# Altium PCB LTE GNSS Tracker.PcbDoc (part 1 of 5)
Units mil, origin at the board's own origin, x right, y up, seen from the top; angles counter-clockwise.
Board outline 2165.35 x 4361.93 mil, 4 copper layers (Top Layer, Layer 1, Layer 2, Bottom Layer), stack 38.189 mil thick; 158 components, 113 nets, 617 pads, 1197 vias.
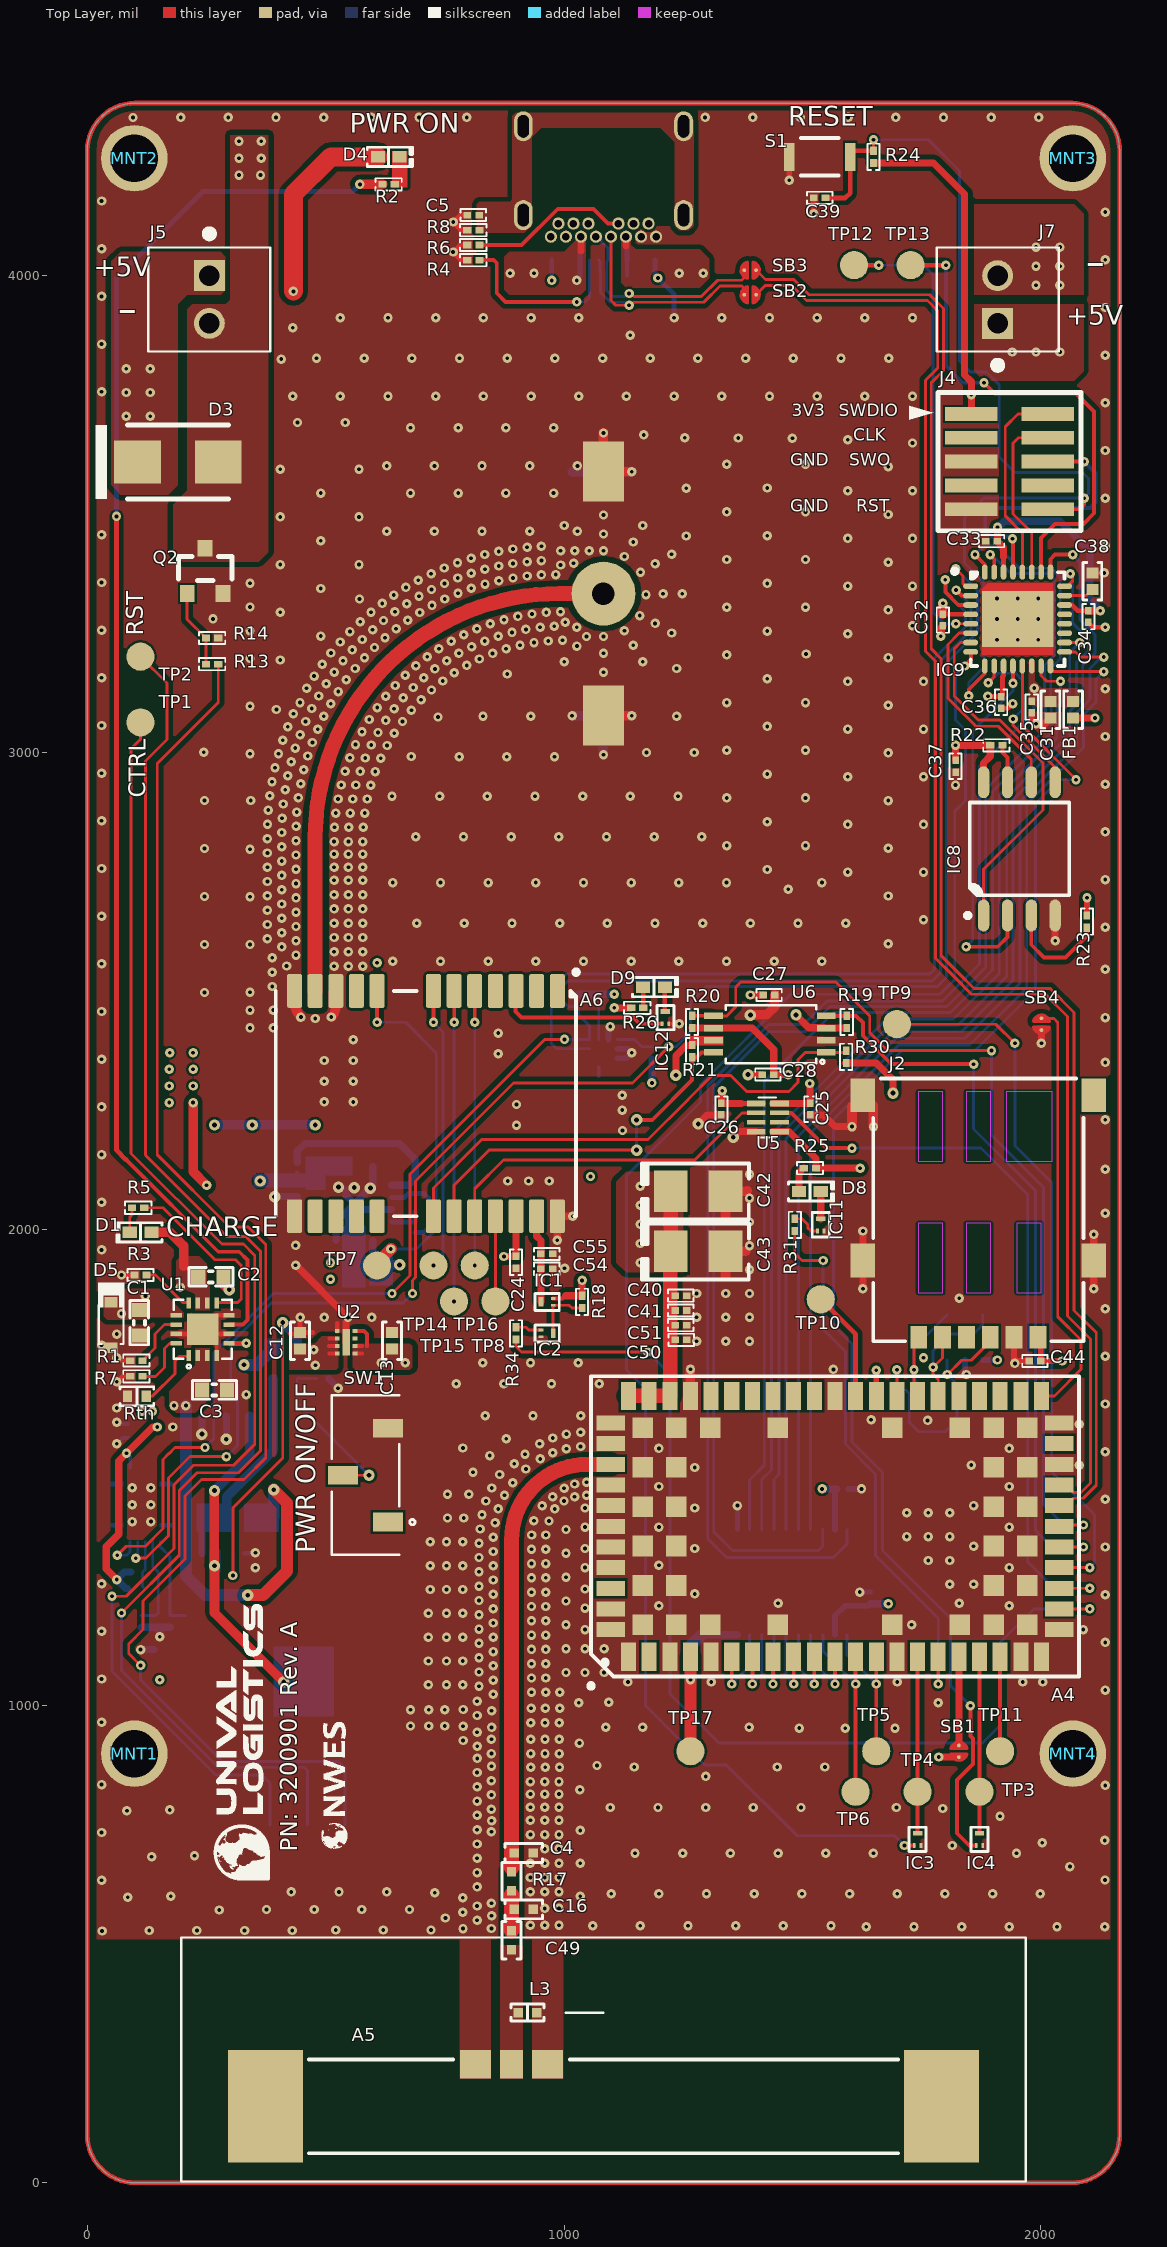
[diagram p0: Top Layer view]
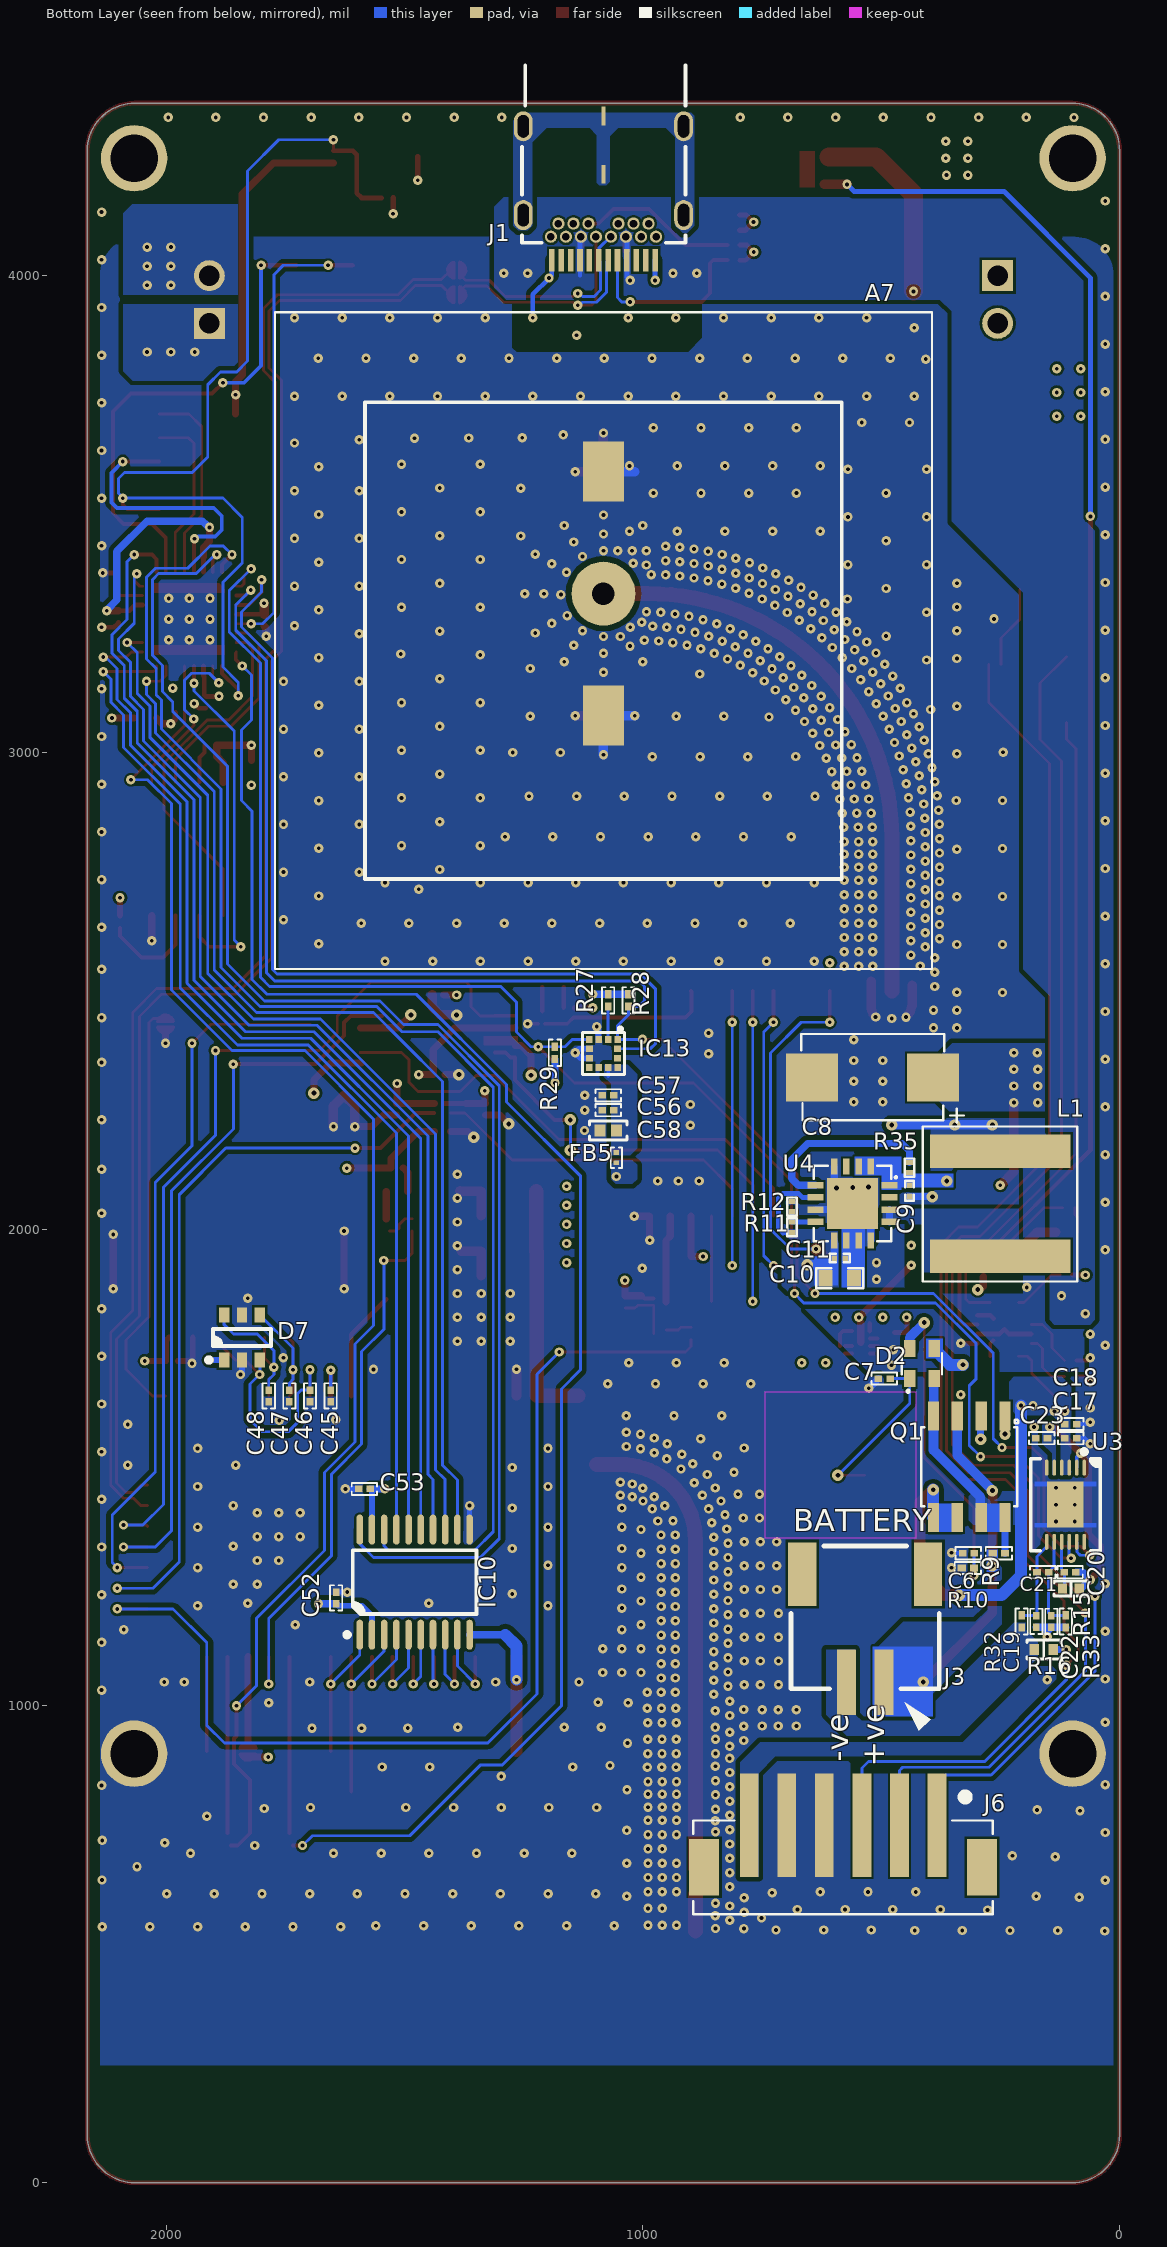
[diagram p1: Bottom Layer view, seen from below]
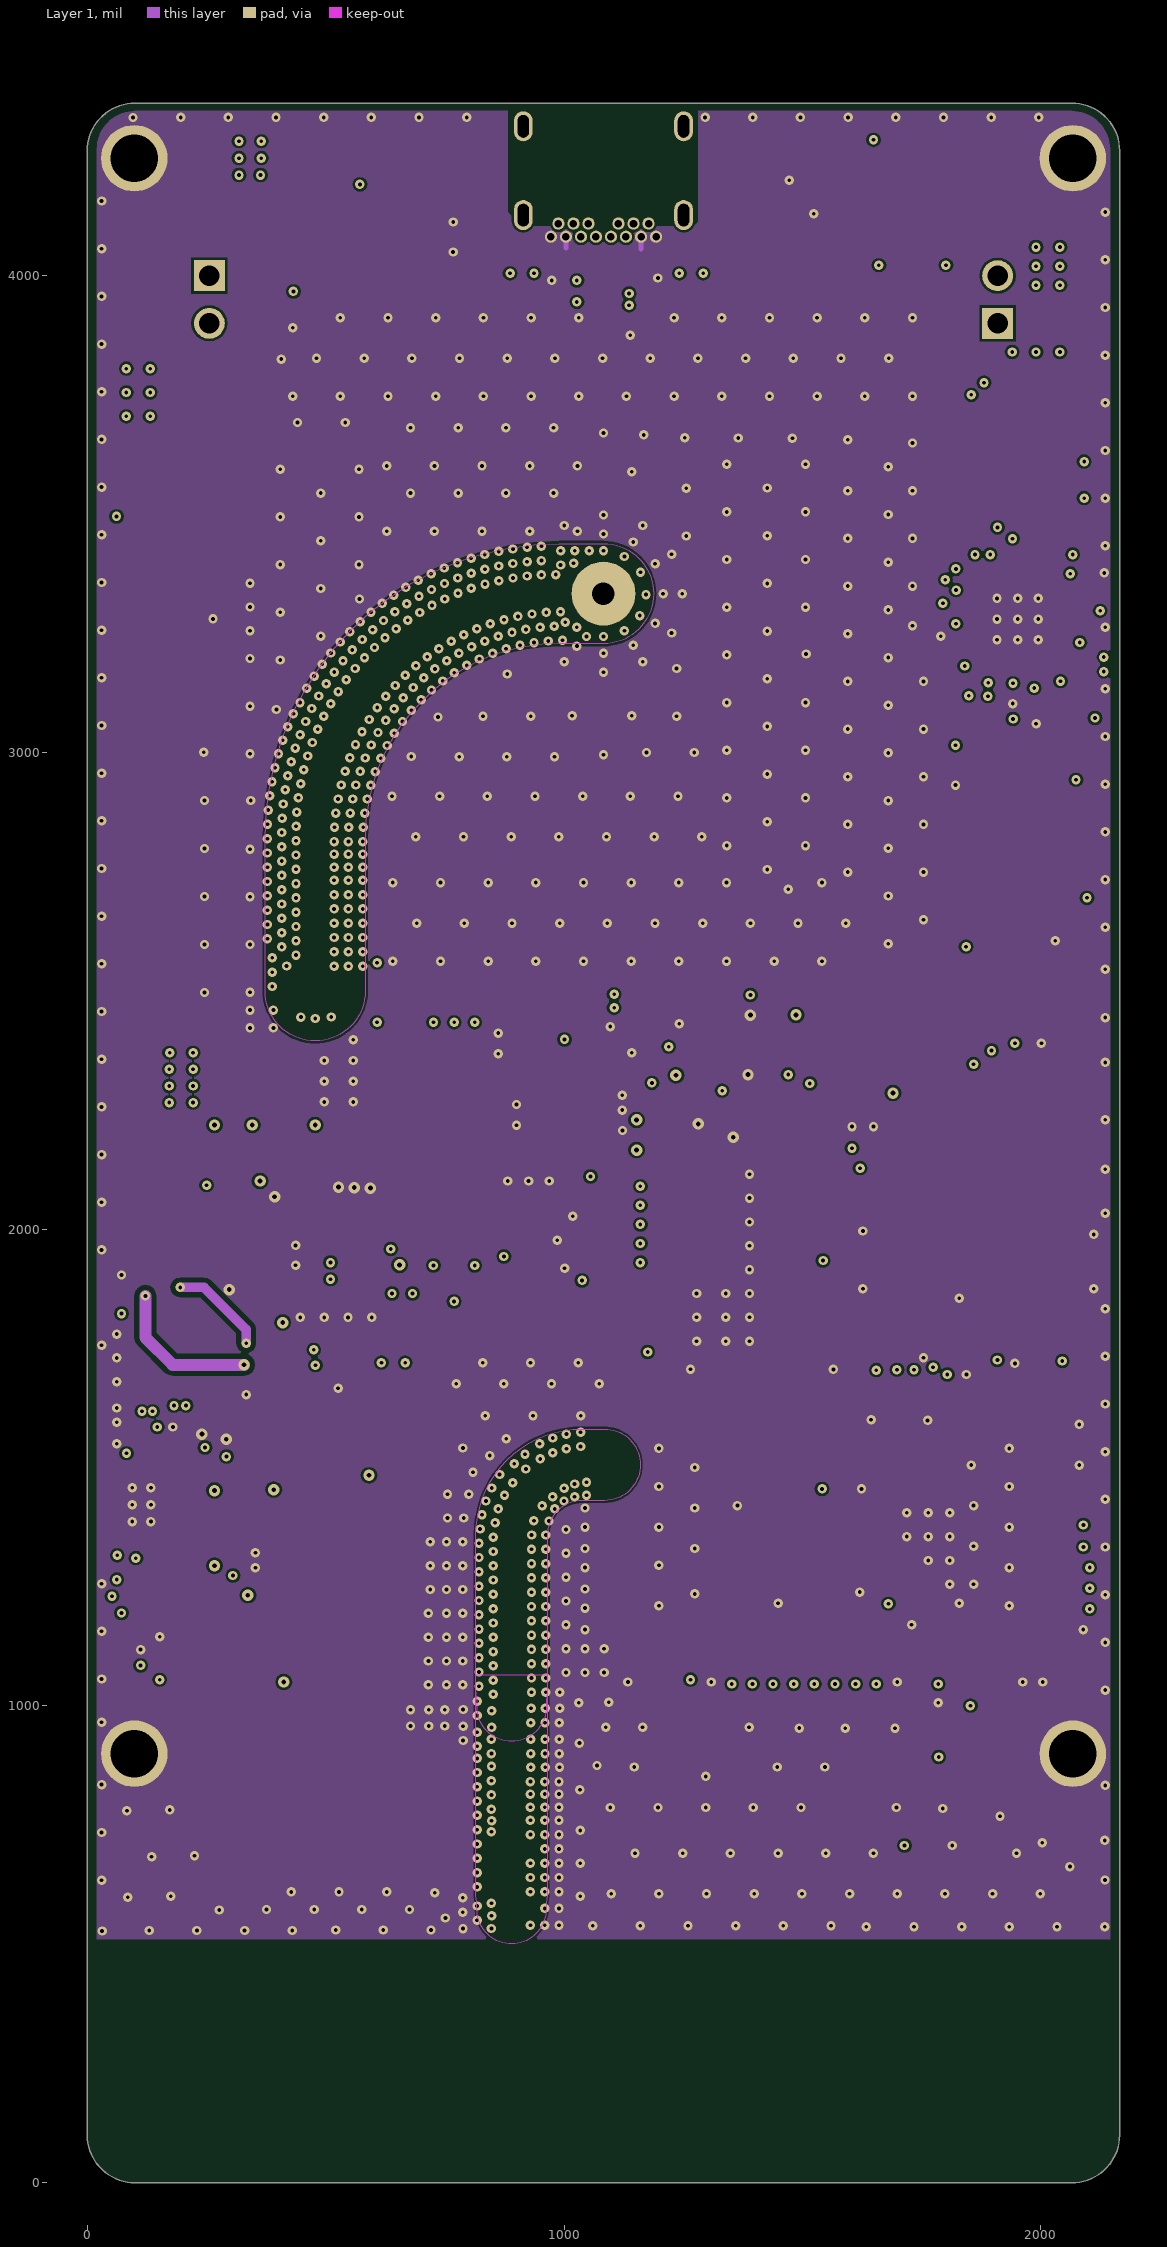
[diagram p2: Layer 1]
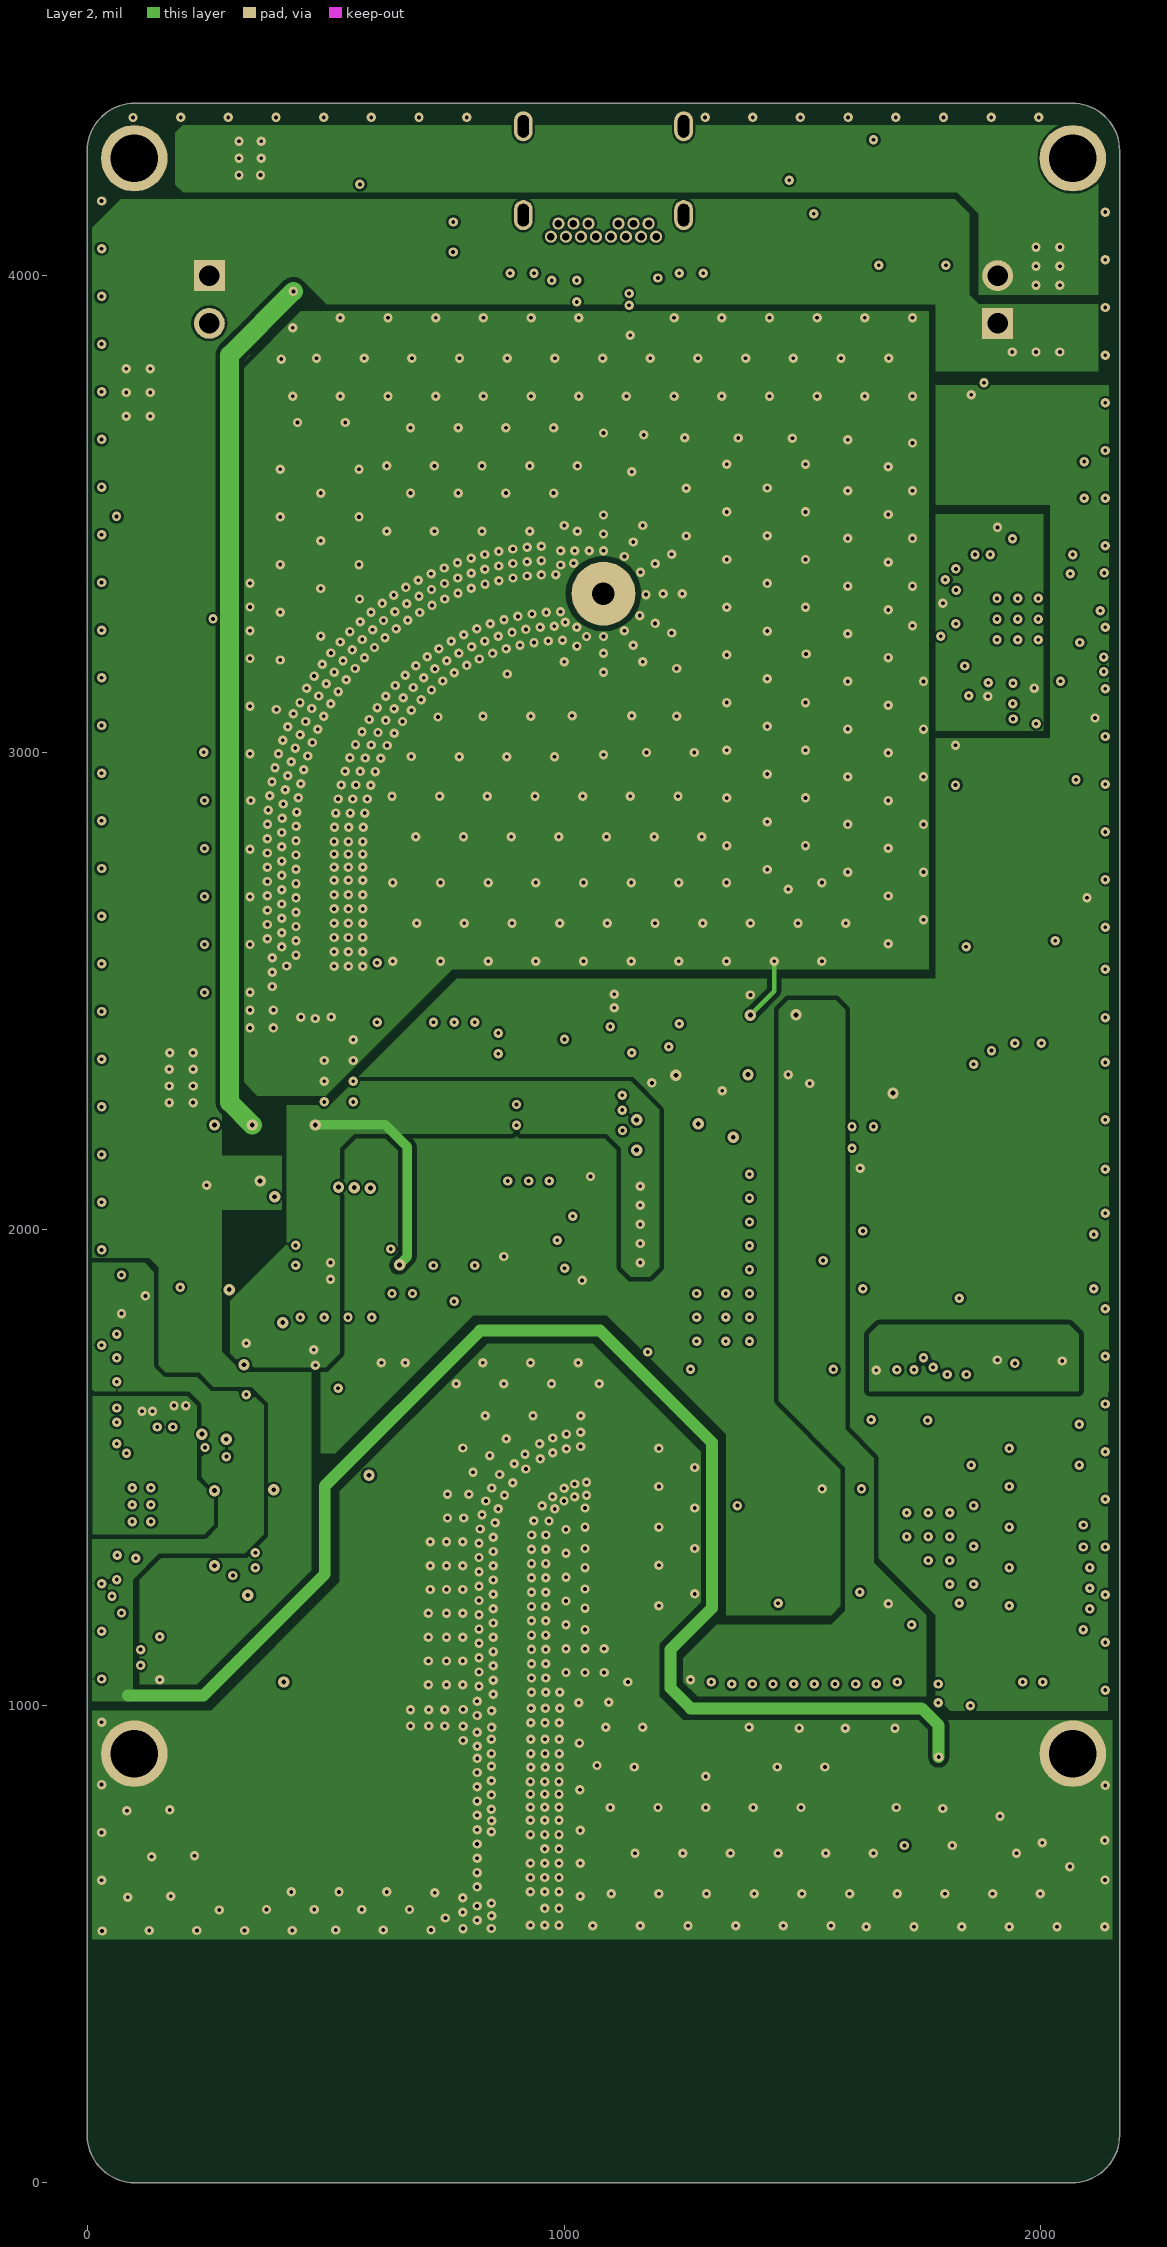
[diagram p3: Layer 2]

## Layer stack, top to bottom
Top Solder: solder mask 1, Solder Resist, Dk 3.8
Top Layer: signal copper 1.378
Dielectric 1: prepreg 7.874, PP-006, Dk 4.6
Layer 1: signal copper 0.689
Dielectric1: core 18.3071, FR-4, Dk 4.8
Layer 2: signal copper 0.689
Dielectric 2: prepreg 7.874, PP-006, Dk 4.6
Bottom Layer: signal copper 1.378
Bottom Solder: solder mask 1, Solder Resist, Dk 3.8

## Board outline
0,100 ccw(c100,100) 100,0 2065.35,0 ccw(c2065.35,100) 2165.35,100 2165.35,4261.93 ccw(c2065.35,4261.93) 2065.35,4361.93 100,4361.93 ccw(c100,4261.93) 0,4261.93

## Design rules (kind name [scope] priority, off if disabled: settings)
AssemblyTestPointUsage [All] p1: valid=2
Clearance Clearance_RF [InNetClass('RF')] p1: gap=11.81 ignorepadtopadclearanceinfootprint=TRUE except(11.77: Arc-SMDPad Track-SMDPad)
Clearance PadClearance [IsPad vs IsPad] p2: gap=10 ignorepadtopadclearanceinfootprint=TRUE
Clearance [All] p3: gap=5 ignorepadtopadclearanceinfootprint=FALSE except(10: Arc-Poly Track-Poly Poly-Poly)
ComponentClearance ComponentClearance_J1 [InComponent('J1')] p1: gap=10 collisioncheckmode=3 verticalgap=-4.33 showdistances=TRUE
ComponentClearance [All] p2: gap=10 collisioncheckmode=3 verticalgap=10 showdistances=FALSE
DiffPairsRouting DiffPair_DiffPairsRouting [InDifferentialPair ('USB_D')] p1: maxlimit=10 minlimit=6 mostfreqgap=6 toplayer_minwidth=6 toplayer_maxwidth=6 toplayer_prefwidth=6 midlayer1_minwidth=6 midlayer1_maxwidth=6 midlayer1_prefwidth=6 midlayer2_minwidth=6 midlayer2_maxwidth=6 midlayer2_prefwidth=6 bottomlayer_minwidth=6 bottomlayer_maxwidth=6 bottomlayer_prefwidth=6 maxuncoupledlength=500
DiffPairsRouting DiffPairsRouting_1 [InDifferentialPair ('USB')] p2: maxlimit=10 minlimit=6 mostfreqgap=6 toplayer_minwidth=6 toplayer_maxwidth=6 toplayer_prefwidth=6 midlayer1_minwidth=6 midlayer1_maxwidth=6 midlayer1_prefwidth=6 midlayer2_minwidth=6 midlayer2_maxwidth=6 midlayer2_prefwidth=6 bottomlayer_minwidth=6 bottomlayer_maxwidth=6 bottomlayer_prefwidth=6 maxuncoupledlength=500
DiffPairsRouting [All] p3: maxlimit=10 minlimit=6 mostfreqgap=6 toplayer_minwidth=6 toplayer_maxwidth=6 toplayer_prefwidth=6 midlayer1_minwidth=6 midlayer1_maxwidth=6 midlayer1_prefwidth=6 midlayer2_minwidth=6 midlayer2_maxwidth=6 midlayer2_prefwidth=6 bottomlayer_minwidth=6 bottomlayer_maxwidth=6 bottomlayer_prefwidth=6 maxuncoupledlength=500
FabricationTestPointUsage [All] p1: valid=2 allowmultiple=FALSE
HoleSize [All] p1: absolutevalues=TRUE maxlimit=248.03 minlimit=7.87 maxpercent=80.000 minpercent=20.000
HoleToHoleClearance [All] p1: gap=7.87 allowstackedmicrovias=TRUE
MatchedLengths DiffPair_MatchedLengths [InDifferentialPair ('USB_D')] p1: tolerance=1000 checknetsindiffpair=FALSE checkdiffpairvsdiffpair=TRUE checkxsignals=TRUE checkothers=TRUE
MatchedLengths [InDifferentialPair ('USB')] p2: tolerance=1000 checknetsindiffpair=FALSE checkdiffpairvsdiffpair=TRUE checkxsignals=TRUE checkothers=TRUE
MinimumAnnularRing [All] p1: minimumring=3
MinimumSolderMaskSliver [All] p1: minsoldermaskwidth=0
PolygonConnect ViaConnect [IsVia] p1: connectstyle=Direct reliefconductorwidth=10 reliefentries=4 polygonreliefangle="90 Angle" airgapwidth=10
PolygonConnect [All] p2: connectstyle=Direct reliefconductorwidth=11.81 reliefentries=4 polygonreliefangle="90 Angle" airgapwidth=10
RoutingVias [All] p1: holewidth=10 width=24 viastyle="Through Hole" minholewidth=7.87 minwidth=19.68 maxholewidth=20 maxwidth=30
SilkToSilkClearance [All] p1: silktosilkclearance=0
SilkToSolderMaskClearance SilkscreenOverComponentPads [IsPad] p1: minsilkscreentomaskgap=0 clearancetoexposedcopper=TRUE
SolderMaskExpansion "Via Tenting" [IsVia] p1: expansion=-78.74 istentingtop=FALSE
SolderMaskExpansion [All] p2: expansion=4 istentingtop=FALSE
Width RF [InNetClass('RF')] p1: maxlimit=31.5 minlimit=31.5 preferedwidth=31.5 // RF Impedance
Width [All] p2: maxlimit=40 minlimit=4 preferedwidth=6
21 further rules are at their usual default settings.

## Classes and differential pairs
component class U_Accelerometer: C56 C57 C58 D3 FB5 IC13 J5 J6 J7 Q2 R13 R14 R27 R28 R29 TP1 TP2
component class U_GPS: A6 A7 C24 C25 C26 C27 C28 C54 C55 D9 IC1 IC2 IC12 R18 R19 R20 R21 R26 R30 R34 TP7 TP8 TP14 TP15 TP16 U5 U6
component class "U_LTE Module": A4 A5 C4 C16 C40 C41 C42 C43 C44 C45 C46 C47 C48 C49 C50 C51 C52 C53 D7 D8 IC10 IC11 J2 L3 R17 R25 R31 SB1 SB2 SB3 SB4 TP3 TP4 TP5 TP6 TP9 TP10 TP11 TP17
component class U_Microcontroller: C31 C32 C33 C34 C35 C36 C37 C38 C39 FB1 IC3 IC4 IC8 IC9 J4 R22 R23 R24 S1 TP12 TP13
component class U_Battery: C1 C2 C3 C5 C6 C7 C8 C9 C10 C11 C12 C13 C17 C18 C19 C20 C21 C22 C23 D1 D2 D4 D5 J1 J3 L1 Q1 R1 R2 R3 R4 R5 R6 R7 R8 R9 R10 R11 R12 R15 R16 R32 R33 R35 Rth SW1 U1 U2 U3 U4
net class RF: GPS_ANT NetA5_S NetC16_2
component class Top: MNT1 MNT2 MNT3 MNT4
differential pair USB: +USB_P -USB_N
differential pair USB_D: +D_P -D_N

## Components (designator, comment, footprint, x,y, rotation, side; value= is the part's Value field where it differs from the comment)
A4 "SARA-R410M-02B-01" "U-BLOX SARA-R4" 1568.26,1376.75 r90 top locked
A5 "ANT-LTE-CER-T" "LINX ANT-LTE-CER-T" 1082.68,160 r180 top locked
A6 "NEO-M8N-0-10" "U-BLOX NEO-M8N" 710.22,2263.51 r270 top locked
A7 "2042860001" "MOLEX 2042860001" 1082.68,3234.65 r180 bottom locked
C1 "10µF" CAPC1608X06L 109,1803.89 r90 top
C2 "10µF" CAPC1608X06L 259.23,1900.17 r180 top
C3 "10µF" CAPC1608X06L 266.75,1663.01 r180 top
C4 "DNP" "CAP 0402_1005"#1 915.31,691.5 r180 top
C5 "0.1µF" "CAP 0201_0603" 809.6,4127.09 r0 top
C6 "0.1µF" "CAP 0201_0603" 317.34,1320.27 r180 bottom
C7 "0.1µF" "CAP 0201_0603" 493.73,1686.63 r180 bottom
C8 "220uF" T491D227K016AT 518.12,2318.5 r0 bottom locked
C9 "2.2uF" "CAP 0201" 440.49,2080.31 r90 bottom
C10 "10µF" "Cap 0603" 587.14,1896.9 r0 bottom
C11 "0.1µF" "CAP 0201" 587.14,1939.4 r0 bottom
C12 "1µF" "CAP 0402_1005"#2 446.1,1766.17 r270 top
C13 "1µF" "CAP 0402_1005"#2 639.03,1766.17 r270 top
C16 "DNP" "CAP 0402_1005"#1 915.31,573.39 r180 top
C17 "0.1µF" "CAP 0201_0603" 102.5,1561.77 r0 bottom
C18 "0.1µF" "CAP 0201_0603" 102.5,1591.26 r0 bottom
C19 "0.1µF" "CAP 0201_0603" 174.83,1177.18 r90 bottom
C20 "0.47µF" "CAP 0201_0603" 103.89,1280.74 r0 bottom
C21 "0.1µF" "CAP 0201_0603" 161.15,1280.74 r0 bottom
C22 "0.1µF" "CAP 0201_0603" 143.17,1177.18 r270 bottom
C23 "0.47µF" "CAP 0201_0603" 163.53,1561.77 r180 bottom
C24 "0.1µF" "CAP 0201_0603" 899.24,1930.56 r90 top
C25 "0.1µF" "CAP 0201_0603" 1516.59,2251.76 r90 top
C26 "0.1µF" "CAP 0201_0603" 1330.13,2251.76 r90 top
C27 "0.1µF" "CAP 0201_0603" 1430.02,2491.2 r180 top
C28 "0.1µF" "CAP 0201_0603" 1427.53,2324.3 r0 top
C31 "10µF" "CAP 0402_1005"#2 2020.2,3089.43 r90 top
C32 "0.1µF" "CAP 0201_0603" 1794.63,3277.55 r90 top
C33 "0.1µF" "CAP 0201_0603" 1896.85,3443.18 r0 top
C34 "0.1µF" "CAP 0201_0603" 2099.85,3284.93 r90 top
C35 "0.1µF" "CAP 0201_0603" 1980.96,3095.05 r90 top
C36 "10000pF" "CAP 0201_0603" 1916.86,3105.05 r90 top
C37 "0.1µF" "CAP 0201_0603" 1821.16,2971.06 r90 top
C38 "1µF" "CAP 0402_1005"#2 2108.19,3359.18 r90 top
C39 "0.1µF" "CAP 0201_0603" 1536.18,4163.14 r0 top
C40 "0.1µF" "CAP 0201_0603" 1244.95,1860.5 r180 top
C41 "10000pF" "CAP 0201_0603" 1244.95,1829.42 r180 top
C42 "470µF" "CAP POL 1411_3528" 1281.17,2079.64 r0 top
C43 "470µF" "CAP POL 1411_3528" 1281.17,1953.66 r0 top
C44 "0.1µF" "CAP 0201_0603" 1987.55,1723.48 r0 top
C45 "47pF" "CAP 0201_0603" 1654.88,1650.37 r90 bottom
C46 "47pF" "CAP 0201_0603" 1698.19,1650.37 r90 bottom
C47 "47pF" "CAP 0201_0603" 1741.49,1650.37 r90 bottom
C48 "47pF" "CAP 0201_0603" 1784.8,1650.37 r90 bottom
C49 "3pF" "CAP 0402_1005"#1 889.76,508.5 r270 top
C50 "15pF" "CAP 0201_0603" 1245.64,1767.8 r180 top
C51 "47pF" "CAP 0201_0603" 1244.95,1798.67 r180 top
C52 "0.1µF" "CAP 0201_0603" 1643.34,1226.61 r270 bottom
C53 "0.1µF" "CAP 0201_0603" 1584.04,1455.18 r180 bottom
C54 "0.1µF" "CAP 0201_0603" 963.73,1917.05 r180 top
C55 "10000pF" "CAP 0201_0603" 963.73,1948.13 r180 top
C56 "0.1µF" "CAP 0201_0603" 1072.83,2249.75 r180 bottom
C57 "0.1µF" "CAP 0201_0603" 1072.83,2280.68 r180 bottom
C58 "10µF" "CAP 0402_1005"#2 1072.83,2207.02 r180 bottom
D1 "Red" "LED 0402_1005 RED" 111.62,1993.44 r180 top
D2 "RB481KTL" RB481KTL 414.66,1718.23 r90 bottom
D3 "ES3AB-13-F" "DIODE INC SMB" 189.96,3609.26 r180 top
D4 "Green" "LED 0402_1005 GREEN" 632.06,4249.25 r0 top
D5 "BZT52C6V2S-F2-0000HF" BZT52C6V2S-F2-0000HF 50,1799.13 r90 top
D7 "DT1042-04SO-7" "DIODES SOT-23-6 W6" 1840.87,1772.86 r90 bottom
D8 "Green" "LED 0402_1005 GREEN" 1515.77,2079.14 r0 top
D9 "Red" "LED 0402_1005 RED" 1188.66,2507.6 r0 top
FB1 "600 Ohms @ 100MHz" "FER 0402_1005" 2067.85,3089.43 r90 top
FB5 "240 Ohms @ 100MHz" "FER 0201_0603" 1055.51,2150.07 r90 bottom
IC1 "CSD23381F4" "TI 3-XFDFN F4 YJC" 964.33,1847.48 r180 top
IC2 "CSD13381F4" "TI 3-XFDFN F4 YJC" 964.33,1781.38 r0 top
IC3 "CSD13381F4" "TI 3-XFDFN F4 YJC" 1741.49,720 r90 top
IC4 "CSD13381F4" "TI 3-XFDFN F4 YJC" 1871.41,720 r90 top
IC8 "W25Q32JVSSIQ TR" "WINBOND SOIC-8 208MIL WIDE" 1955.1,2797.7 r90 top
IC9 "EFM32TG11B520F128GM32-B" "SI LABS QFN-32(5x5)" 1951.4,3279.74 r0 top
IC10 "TXB0108PWR" "TI TSSOP-20 PW" 1478.7,1259.62 r90 bottom
IC11 "CSD13381F4" "TI 3-XFDFN F4 YJC" 1538.41,2009.09 r90 top
IC12 "CSD13381F4" "TI 3-XFDFN F4 YJC" 1212.6,2443.74 r90 top
IC13 "LIS2DH12TR" "ST LGA-12 2x2MM" 1082.68,2368.5 r270 bottom
J1 "632723100011" 632723100011 1082.68,4266.06 r0 bottom locked
J2 "SIM8060-6-1-14-00-A" "GCT SIM8060-6-1-14-00-A" 1868.91,2040.59 r180 top locked
J3 "S2B-PH-SM4-TB(LF)(SN)" JST_S2B-PH-SM4-TB(LF)(SN) 533.74,1050 r0 bottom locked
J4 "SWD" FTSH-105-01-XXX-DV-K 1934.3,3610 r270 top
J5 "solenoid lock" MOLEX_282834-2 255.91,3950 r270 top locked
J6 "KEYPAD" JST_B6B-PH-SM4-TB(LF)(SN) 580,750 r0 bottom
J7 "solenoid lock" MOLEX_282834-2 1909.45,3950 r90 top locked
L1 "2.2uH" NRS8030T2R2NJGJ 250.28,2053.34 r270 bottom locked
L3 "6.8nH" "IND 0402_1005 RF WW" 923.23,356.85 r180 top
MNT1 "MOUNTING HOLE" MNT620-275N 98.61,899.93 r0 top
MNT2 "MOUNTING HOLE" MNT620-275N 98.61,4246.38 r0 top
MNT3 "MOUNTING HOLE" MNT620-275N 2067.11,4246.38 r0 top
MNT4 "MOUNTING HOLE" MNT620-275N 2067.11,899.93 r0 top
Q1 "DMC3021LSD-13" DMC2020USD-13 315.43,1501.47 r270 bottom locked
Q2 "ZXMN2A14FTA" SOT-23 247.35,3381 r0 top locked
R1 "46.4K" "RES 0201_0603" 103,1724.45 r180 top
R2 "1.5K" "RES 0201_0603" 632.06,4191.42 r0 top
R3 "1.18K" "RES 0201_0603" 111.62,1903.86 r0 top
R4 "5.1 kOhms" "RES 0201_0603" 809.6,4032.6 r180 top
R5 "1.5K" "RES 0201_0603" 106.75,2044.9 r180 top
R6 "5.1 kOhms" "RES 0201_0603" 809.6,4064.33 r180 top
R7 "1.13K" "RES 0201_0603" 103,1691.24 r180 top
R8 "330 Ohms" "RES 0201_0603" 809.6,4095.59 r180 top
R9 "100K" "RES 0201_0603" 253.16,1320.27 r0 bottom
R10 "1M" "RES 0201_0603" 318.34,1289.37 r180 bottom
R11 "2M" Res-0201 687.14,2004.04 r270 bottom
R12 "390K" Res-0201 687.14,2047.37 r90 bottom
R13 "3.3 kOhms" "RES 0201_0603" 261.89,3185.05 r0 top
R14 "100K" "RES 0201_0603" 261.8,3239.95 r180 top
R15 "NTCG103JF103FT1" "NTC 0402_1005" 102.11,1246.39 r0 bottom
R16 "10 mOhms" "STACKPOLE CSR0402" 159.08,1118.35 r0 bottom
R17 "0" "CAP 0402_1005"#1 889.76,632.44 r90 top
R18 "100K" "RES 0201_0603" 1037.77,1847.48 r90 top
R19 "3.3K" "RES 0201_0603" 1592.89,2434.67 r90 top
R20 "3.3K" "RES 0201_0603" 1268.54,2434.67 r90 top
R21 "3.3K" "RES 0201_0603" 1268.54,2373.4 r270 top
R22 "3.3 kOhms" "RES 0201_0603" 1906.75,3014.9 r180 top
R23 "3.3 kOhms" "RES 0201_0603" 2096.8,2645.05 r90 top
R24 "3.3 kOhms" "RES 0201_0603" 1649.01,4249.24 r270 top
R25 "1 kOhms" "RES 0201_0603" 1515.77,2128.04 r180 top
R26 "1 kOhms" "RES 0201_0603" 1153.57,2464.3 r0 top
R27 "3.3 kOhms" "RES 0201_0603" 1072.9,2480 r90 bottom
R28 "3.3 kOhms" "RES 0201_0603" 1030.15,2480 r90 bottom
R29 "3.3 kOhms" "RES 0201_0603" 1184.55,2370 r270 bottom
R30 "3.3K" "RES 0201_0603" 1591.82,2361.39 r90 top
R31 "10K" "RES 0201_0603" 1484,2009.09 r90 top
R32 "100 Ohms" "RES 0201_0603" 205.6,1177.18 r270 bottom
R33 "100 Ohms" "RES 0201_0603" 112.83,1177.18 r270 bottom
R34 "10K" "RES 0201_0603" 899.24,1781.38 r90 top
R35 "1M" Res-0201 440.49,2129.38 r90 bottom
Rth "10K" "STACKPOLE CSR0402" 104.11,1649.56 r180 top
S1 "KXT 311 LHS" "C&K KXT3" 1536.18,4249.24 r180 top
SB1 "Solderbridge" Solderbridge#1 1828.11,904.93 r90 top
SB2 "Solderbridge" Solderbridge#2 1390.49,3960 r0 top
SB3 "Solderbridge" Solderbridge#2 1390.49,4011.48 r0 top
SB4 "Solderbridge" Solderbridge#2 2001.33,2430 r270 top
SW1 "PWR ON/OFF" SW_JS102011JCQN 583.43,1484.06 r90 top
TP1 "Test Point" "Test Point" 111.53,3063.04 r0 top
TP2 "Test Point" "Test Point" 111.53,3200.79 r90 top
TP3 "Test Point" "Test Point" 1871.41,820 r90 top
TP4 "Test Point" "Test Point" 1741.49,820 r90 top
TP5 "Test Point" "Test Point" 1654.87,904.93 r90 top
TP6 "Test Point" "Test Point" 1611.57,820 r90 top
TP7 "Test Point" "Test Point" 607.9,1923.88 r90 top
TP8 "Test Point" "Test Point" 855.93,1848.51 r90 top
TP9 "Test Point" "Test Point" 1698.18,2430 r90 top
TP10 "Test Point" "Test Point" 1538.41,1852.94 r90 top
TP11 "Test Point" "Test Point" 1914.72,904.93 r90 top
TP12 "Test Point" "Test Point" 1608.43,4022.03 r90 top
TP13 "Test Point" "Test Point" 1726.95,4022.03 r90 top
TP14 "Test Point" "Test Point" 726.01,1923.88 r90 top
TP15 "Test Point" "Test Point" 769.32,1848.51 r90 top
TP16 "Test Point" "Test Point" 812.63,1923.88 r90 top
TP17 "Test Point" "Test Point" 1265.11,904.93 r90 top
U1 "BQ24079TRGTT" BQ24079TRGTT 241.97,1790.05 r90 top locked
U2 "NCP186BMX330TAG" 8-XDFN 542.98,1762.8 r180 top
U3 "BQ27542DRZR-G1" "TI SON-12 DRZ" 113.75,1422.05 r270 bottom locked
U4 "TPS61032RSAR" TPS61032RSAR 560.37,2053.88 r270 bottom locked
U5 "74AVCH2T45GT,115" 74AVCH2T45GT,115 1427.55,2234.2 r0 top locked
U6 "NTB0102DP-Q100H" NTB0102DP-Q100H 1431.83,2409.1 r180 top

## Footprints (in the part's own frame and the unit in brackets; to place one, negate y for a bottom-side part, rotate by r counter-clockwise, add the part's x,y. Pads: shape width x height; smd on the part's side, far side on the other; paste and mask are expansions set on the pad)
8-XDFN [mil]
  rect 10x9 smd paste-4.5 mask+0: 1(-18.7,23.62) 2(-18.7,7.87) 3(-18.7,-7.87) 4(-18.7,-23.62) 5(18.7,-23.62) 6(18.7,-7.87) 7(18.7,7.87) 8(18.7,23.62)
  rect 16x55 smd paste-8 mask+0: 9(0,0)
  Top Layer region: 0,-27.5 0,-27.5 0,-27.5 0,-27.5 0,-27.5 0,-27.5 0,-27.5 0,-27.5
  Top Layer region: 0,27.5 0,27.5 0,27.5 0,27.5 0,27.5 0,27.5 0,27.5 0,27.5
  body extent -26,-34 26,34, height 18
74AVCH2T45GT,115 [mm]
  rect 1x0.3 smd: 1(-0.625,0.75) 1(-0.625,0.75) 4(-0.625,-0.75) 5(0.625,-0.75) 8(0.625,0.75)
  rect 1x0.25 smd: 2(-0.625,0.25) 3(-0.625,-0.25) 6(0.625,-0.25) 7(0.625,0.25)
  silkscreen extent -0.48,-1.07 0.43,1.07, body extent -0.51,-0.97 0.49,0.97, height 0.46
632723100011 [mm] "USB 3.1 Type C Receptacle Horizontal THR"
  rect 0.3x1.2 smd mask+0.05: A1(-2.75,5.93) A2(-2.25,5.93) A3(-1.75,5.93) A4(-1.25,5.93) A5(-0.75,5.93) A6(-0.25,5.93) A7(0.25,5.93) A8(0.75,5.93) A9(1.25,5.93) A10(1.75,5.93) A11(2.25,5.93) A12(2.75,5.93)
  round 0.65 hole 0.4 mask+0.05: B1(2.8,4.68) B2(2.4,3.98) B3(1.6,3.98) B4(1.2,4.68) B5(0.8,3.98) B6(0.4,4.68) B7(-0.4,4.68) B8(-0.8,3.98) B9(-1.2,4.68) B10(-1.6,3.98) B11(-2.4,3.98) B12(-2.8,4.68) G1(2,4.68) G2(-2,4.68)
  oval 1x1.6 hole 0.6 slot 1.2 at 90 deg: SH1(-4.27,3.53) SH2(4.27,3.53) SH3(4.27,-1.2) SH4(-4.27,-1.2)
  rect 0.2x1 smd: SH3(0,1.35) SH4(0,-1.75)
  silkscreen extent -4.37,-4.45 4.34,5, body extent -4.37,-5.6 4.37,6.19, height 3.05
BQ24079TRGTT [mm]
  rect 0.6x0.24 smd: 1(-1.4,0.75) 2(-1.4,0.25) 3(-1.4,-0.25) 4(-1.4,-0.75) 9(1.4,-0.75) 10(1.4,-0.25) 11(1.4,0.25) 12(1.4,0.75)
  rect 0.24x0.6 smd: 5(-0.75,-1.4) 6(-0.25,-1.4) 7(0.25,-1.4) 8(0.75,-1.4) 13(0.75,1.4) 14(0.25,1.4) 15(-0.25,1.4) 16(-0.75,1.4)
  rect 1.68x1.68 smd: 17(0,0)
  silkscreen extent -2.09,-1.55 1.57,1.55, body extent -1.5,-1.5 1.5,1.5, height 1
BZT52C6V2S-F2-0000HF [mil]
  rect 22x27 smd: 1(48,0) 2(-48,0)
  silkscreen extent -40,-28 89,28, body extent -49,-25 49,24, height 35
"C&K KXT3" [mm]
  rect 0.55x1.5 smd: 1(-1.625,0) 2(1.625,0)
  silkscreen extent -1,-1 1,1, body extent -1.75,-1 1.75,1, height 0.58
"CAP 0201" [mm]
  rect 0.3x0.3 smd mask+0.055: 1(-0.3,0) 2(0.3,0)
  silkscreen extent -0.53,-0.23 0.53,0.23, body extent -0.3,-0.15 0.3,0.15, height 0.28
"CAP 0201_0603" [mm] "Chip Capacitor, 2-Leads, Body 0.60x0.30mm, IPC Medium Density"
  rect 0.4x0.35 smd: 1(-0.31,0) 2(0.31,0)
  silkscreen extent -0.67,-0.33 0.67,0.33, body extent -0.3,-0.15 0.3,0.15, height 0.3
"CAP 0402_1005"#1 [mm] "Chip Capacitor, 2-Leads, Body 1.02x0.51mm, IPC Medium Density"
  rect 0.5x0.5 smd: 1(-0.5,0) 2(0.5,0)
  silkscreen extent -1,-0.5 1,0.5, body extent -0.5,-0.26 0.5,0.26, height 0.52
"CAP 0402_1005"#2 [mm] "Chip Capacitor, 2-Leads, Body 1.02x0.51mm, IPC Medium Density"
  rect 0.6x0.64 smd: 1(-0.44,0) 2(0.44,0)
  silkscreen extent -1,-0.5 1,0.5, body extent -0.5,-0.26 0.5,0.26, height 0.52
"Cap 0603" [mil]
  rect 30x35 smd mask+2.36: 1(-30,0) 2(30,0)
  silkscreen extent -49,-21 49,21, body extent -32,-16 31,16, height 34
"CAP POL 1411_3528" [mm] "Molded Capacitor, 2-Leads, Body 3.50x2.80mm, IPC Medium Density"
  rect 1.8x2.23 smd: 1(-1.46,0) 2(1.46,0)
  silkscreen extent -3,-1.5 2.71,1.48, body extent -1.87,-1.45 1.86,1.45, height 2
CAPC1608X06L [mm]
  rect 0.75x0.8 smd: 1(-0.675,0) 2(0.675,0)
  silkscreen extent -1.17,-0.5 1.17,0.5, body extent -0.8,-0.43 0.8,0.43, height 0.8
"DIODE INC SMB" [mm] "RECTIFIER GPP 400V 1A"
  rect 2.5x2.3 smd: A(-2.15,0) C(2.15,0)
  silkscreen extent -2.7,-1.97 4.38,1.97, body extent -2.7,-1.95 2.7,1.95, height 2.5
"DIODES SOT-23-6 W6" [mm] "SOT23, 6-Leads, Body 3.00x2.85mm, Pitch 0.95mm, IPC Medium Density"
  rect 0.8x0.55 smd: 1(-1.2,0.95) 2(-1.2,0) 3(-1.2,-0.95) 4(1.2,-0.95) 5(1.2,0) 6(1.2,0.95)
  silkscreen extent -1.32,-1.55 0.45,1.9, body extent -1.19,-1.45 1.2,1.45, height 1
DMC2020USD-13 [mm]
  rect 1.55x0.6 smd: 1(-2.7,1.905) 2(-2.7,0.635) 3(-2.7,-0.635) 4(-2.7,-1.905) 5(2.7,-1.905) 6(2.7,-0.635) 7(2.7,0.635) 8(2.7,1.905)
  silkscreen extent -2.52,-2.57 2.11,2.62, body extent -3.1,-2.5 3.1,2.5, height 1.7
"FER 0201_0603" [mm] "Chip Inductor, 2-Leads, Body 0.60x0.30mm, IPC Medium Density"
  rect 0.25x0.3 smd: 1(-0.275,0) 2(0.275,0)
  silkscreen extent -0.55,-0.3 0.55,0.3, body extent -0.3,-0.15 0.3,0.15, height 0.29
"FER 0402_1005" [mm] "Chip Ferrite, 2-Leads, Body 1.02x0.51mm, IPC Medium Density"
  rect 0.6x0.64 smd: 1(-0.44,0) 2(0.44,0)
  silkscreen extent -1,-0.5 1,0.5, body extent -0.5,-0.26 0.5,0.26, height 0.52
FTSH-105-01-XXX-DV-K [mil]
  rect 29x110 smd mask+2: 1(-100,-80) 2(-100,80) 3(-50,-80) 4(-50,80) 5(0,-80) 6(0,80) 7(50,-80) 8(50,80) 9(100,-80) 10(100,80)
  silkscreen extent -145,-210 145,150, body extent -125,-115 125,115, height 241
"GCT SIM8060-6-1-14-00-A" [mm] "6 Position Card Connector NANO SIM Surface Mount, Right Angle Gold"
  rect 0.9x1.2 smd: C1(-3.175,6.8) C2(-0.635,6.8) C3(1.905,6.8) C5(-1.905,6.8) C6(0.635,6.8) C7(3.175,6.8)
  rect 1.3x1.8 smd: S(-6.15,2.7) S(6.15,2.7) S(6.15,-6.1) SW(-6.15,-6.1)
  Top Layer keep-out region: 1.89,-6.3 3.19,-6.3 3.19,-2.6 1.89,-2.6
  Top Layer keep-out region: -0.65,-6.3 0.65,-6.3 0.65,-2.6 -0.65,-2.6
  Top Layer keep-out region: -0.65,0.72 0.65,0.72 0.65,4.42 -0.65,4.42
  Top Layer keep-out region: 1.89,0.72 3.19,0.72 3.19,4.42 1.89,4.42
  Top Layer keep-out region: -3.93,-6.3 -1.49,-6.3 -1.49,-2.6 -3.93,-2.6
  Top Layer keep-out region: -3.36,0.72 -2.06,0.72 -2.06,4.42 -3.36,4.42
  silkscreen extent -5.6,-7 5.6,7, body extent -6.2,-7 6.2,7.1, height 1.4
"IND 0402_1005 RF WW" [mm] "Chip Inductor, 2-Leads, Body 1.00x0.50mm, IPC High Density"
  rect 0.5x0.5 smd: 1(-0.5,0) 2(0.5,0)
  silkscreen extent -0.87,-0.45 0.87,0.45, body extent -0.5,-0.29 0.5,0.29, height 0.51
JST_B6B-PH-SM4-TB(LF)(SN) [mm]
  rect 1x5.5 smd: 1(-5,0) 2(-3,0) 3(-1,0) 4(1,0) 5(3,0) 6(5,0)
  rect 1.6x3 smd: P1(-7.4,2.25) P2(7.4,2.25)
  silkscreen extent -7.98,-1.7 7.98,4.75, body extent -7.97,-2.24 7.98,4.76, height 6.6
JST_S2B-PH-SM4-TB(LF)(SN) [mm]
  rect 1x3.5 smd: 1(-1,0) 2(1,0)
  rect 1.5x3.4 smd: P1(-3.35,-5.75) P2(3.35,-5.75)
  silkscreen extent -3.95,-7.25 3.95,2.6, body extent -3.95,-7.25 3.95,1.35, height 5.65
"LED 0402_1005 GREEN" [mm] "Chip Diode, 2-Leads, Body 1.00x0.50mm, IPC Medium Density"
  rect 0.75x0.6 smd: 1(-0.575,0) 2(0.575,0)
  silkscreen extent -1.14,-0.51 1.27,0.51, body extent -0.5,-0.25 0.5,0.25, height 0.21
"LED 0402_1005 RED" [mm] "Chip Diode, 2-Leads, Body 1.00x0.50mm, IPC Medium Density"
  rect 0.75x0.6 smd: 1(-0.575,0) 2(0.575,0)
  silkscreen extent -1.14,-0.51 1.27,0.51, body extent -0.5,-0.25 0.5,0.25, height 0.21
"LINX ANT-LTE-CER-T" [mm] "Antenna, 5-leads, Body 37x5x5mm,  IPC Medium Density"
  rect 4x6 smd: 0(-18,0) 0(18,0)
  rect 1.65x1.5 smd: G(2.975,-2.25) G(6.825,-2.25)
  rect 1.2x1.5 smd: S(4.9,-2.25)
  silkscreen extent -22.5,-9 22.5,4, body extent -18.5,-2.5 18.5,2.5, height 5.16
MNT620-275N [mm]
  round 3.54 hole 2.54 paste-3.15: 1(0,0)
"MOLEX 2042860001" [mm]
  rect 2.2x3.2 smd far side paste-10: G(0,-4) G(0,9)
  rect 2.2x3.2 smd paste-10: G(0,-4) G(0,9)
  round 3.4 hole 1.2: S(0,2.5)
  silkscreen extent -17.5,-17.5 17.5,17.5, body extent -12.5,-12.5 12.5,12.5, height 5.15
MOLEX_282834-2 [mm]
  rect 1.65x1.65 hole 1.1: 1(-1.27,0)
  round 1.65 hole 1.1: 2(1.27,0)
  silkscreen extent -3.7,-3.25 2.77,3.25, body extent -2.77,-3.25 2.77,3.25, height 10
NRS8030T2R2NJGJ [mm] "FIXED IND 2.2UH 4.8A 19.5MOHM SM"
  rect 1.8x7.5 smd: 1(-2.8,0) 2(2.8,0)
  silkscreen extent -4.11,-4.14 4.14,4.09, body extent -4.1,-4.13 4.1,4.08, height 3
NTB0102DP-Q100H [mm]
  rect 1x0.35 smd: 1(-3,0.975) 2(-3,0.325) 3(-3,-0.325) 4(-3,-0.975) 5(3,-0.975) 6(3,-0.325) 7(3,0.325) 8(3,0.975)
  silkscreen extent -2.9,-1.55 2.36,1.58, body extent -3.2,-1.5 3.2,1.5, height 1.2
"NTC 0402_1005" [mm] "Chip Thermistor, 2-Leads, Body 1.00x0.50mm, IPC Medium Density"
  rect 0.5x0.55 smd: 1(-0.45,0) 2(0.45,0)
  silkscreen extent -0.9,-0.4 0.9,0.4, body extent -0.5,-0.26 0.5,0.26, height 0.52
RB481KTL [mm]
  rect 0.9x0.6 smd: 1(-0.8,0.65) 2(-0.8,-0.65) 3(0.8,-0.65) 4(0.8,0.65)
  silkscreen extent -1.55,-1.07 0.56,1.07, body extent -1.1,-1 1.11,1, height 0.99
"RES 0201_0603" [mm] "Chip Resistor, 2-Leads, Body 0.60x0.30mm, IPC Medium Density"
  rect 0.44x0.35 smd: 1(-0.325,0) 2(0.325,0)
  silkscreen extent -0.7,-0.33 0.7,0.33, body extent -0.3,-0.15 0.3,0.15, height 0.21
Res-0201 [mm]
  rect 0.27x0.37 smd: 1(-0.275,0) 2(0.275,0)
  silkscreen extent -0.48,-0.25 0.48,0.25, body extent -0.3,-0.15 0.3,0.15, height 0.29
"SI LABS QFN-32(5x5)" [mm] "QFN, 32-Leads, Body 5.00x5.00mm, Pitch 0.50mm, Thermal Pad 3.80x3.80mm, IPC Medium Density"
  rect 3.8x3 smd: 0(0,0)
  oval 0.8x0.3 smd mask+0.051: 1(-2.5,1.75) 2(-2.5,1.25) 3(-2.5,0.75) 4(-2.5,0.25) 5(-2.5,-0.25) 6(-2.5,-0.75) 7(-2.5,-1.25) 8(-2.5,-1.75) 17(2.5,-1.75) 18(2.5,-1.25) 19(2.5,-0.75) 20(2.5,-0.25) 21(2.5,0.25) 22(2.5,0.75) 23(2.5,1.25) 24(2.5,1.75)
  oval 0.3x0.8 smd mask+0.051: 9(-1.75,-2.5) 10(-1.25,-2.5) 11(-0.75,-2.5) 12(-0.25,-2.5) 13(0.25,-2.5) 14(0.75,-2.5) 15(1.25,-2.5) 16(1.75,-2.5) 25(1.75,2.5) 26(1.25,2.5) 27(0.75,2.5) 28(0.25,2.5) 29(-0.25,2.5) 30(-0.75,2.5) 31(-1.25,2.5) 32(-1.75,2.5)
  Top Layer region: -1.9,-1.4 -1.9,-1.9 1.9,-1.9 1.9,-1.4
  Top Layer region: -1.9,1.6 -1.6,1.9 1.9,1.9 1.9,1.4 -1.9,1.4
  silkscreen extent -3.47,-2.5 2.5,2.67, body extent -2.5,-2.5 2.5,2.5, height 0.8
Solderbridge#1 [mm]
  round 0.2 smd paste-10: 1(-0.312,0) 2(0.312,0)
  Top Layer region: 0.077,0.432 0.152,0.505 0.271,0.467 0.335,0.424 0.409,0.351 0.462,0.292 0.521,0.193 0.549,0.099 0.544,-0.122 0.518,-0.193 0.434,-0.33 0.351,-0.411 0.259,-0.469 0.157,-0.5 0.107,-0.483 0.077,-0.43
  Top Layer region: -0.077,-0.432 -0.152,-0.505 -0.271,-0.467 -0.335,-0.424 -0.409,-0.351 -0.462,-0.292 -0.521,-0.193 -0.549,-0.099 -0.544,0.122 -0.518,0.193 -0.434,0.33 -0.351,0.411 -0.259,0.469 -0.157,0.5 -0.107,0.483 -0.077,0.43
  Top Layer lines w0.152: -0.153,0.431 ccw(c-0.042,0) -0.312,0.353 ccw(c-0.042,0) -0.487,0 ccw(c-0.042,0) -0.153,-0.431 ; 0.153,0.431 cw(c0.042,0) 0.487,0 cw(c0.042,0) 0.153,-0.431
Solderbridge#2 [mm]
  round 0.2 smd paste-10: 1(-0.312,0) 2(0.312,0)
  Top Layer region: 0.077,0.432 0.152,0.505 0.271,0.467 0.335,0.424 0.409,0.351 0.462,0.292 0.521,0.193 0.549,0.099 0.544,-0.122 0.518,-0.193 0.434,-0.33 0.351,-0.411 0.259,-0.469 0.157,-0.5 0.107,-0.483 0.077,-0.43
  Top Layer region: -0.077,-0.432 -0.152,-0.505 -0.271,-0.467 -0.335,-0.424 -0.409,-0.351 -0.462,-0.292 -0.521,-0.193 -0.549,-0.099 -0.544,0.122 -0.518,0.193 -0.434,0.33 -0.351,0.411 -0.259,0.469 -0.157,0.5 -0.107,0.483 -0.077,0.43
  Top Layer lines w0.152: -0.153,-0.431 cw(c-0.042,0) -0.487,0 cw(c-0.042,0) -0.153,0.431 ; 0.153,-0.431 ccw(c0.042,0) 0.153,0.431
SOT-23 [mil]
  rect 31x35 smd: 1(-37.5,-47.5) 2(37.5,-47.5) 3(-0.5,47.5)
  silkscreen extent -56,-20 56,30, body extent -58,-44 56,52, height 38
"ST LGA-12 2x2MM" [mm] "LGA, 12-Leads, Body 2.00x2.20mm, Pitch 0.50mm, IPC Medium Density"
  rect 0.375x0.35 smd: 1(-0.75,0.75) 2(-0.75,0.25) 3(-0.75,-0.25) 4(-0.75,-0.75) 7(0.75,-0.75) 8(0.75,-0.25) 9(0.75,0.25) 10(0.75,0.75)
  rect 0.35x0.375 smd: 5(-0.25,-0.75) 6(0.25,-0.75) 11(0.25,0.75) 12(-0.25,0.75)
  silkscreen extent -1.39,-1.12 1.12,1.12, body extent -1,-1 1,1, height 1
"STACKPOLE CSR0402" [mm] "Chip Resistor, 2-Leads, Body 1.0x0.5mm, IPC Medium Density"
  rect 0.5x0.6 smd: 1(-0.5,0) 2(0.5,0)
  silkscreen extent -0.9,-0.51 0.9,0.51, body extent -0.52,-0.25 0.53,0.25, height 0.32
SW_JS102011JCQN [mm]
  rect 1x1.6 smd: 1(-2.5,-1.2) 2(0,1.2) 3(2.5,-1.2)
  silkscreen extent -4.25,-2.64 4.25,1.8, body extent -4.25,-2 4.25,2, height 5.4
T491D227K016AT [mm] "CAP TANT 220UF 10% 16V 2917"
  rect 2.77x2.55 smd: 1(-3.22,0) 2(3.22,0)
  silkscreen extent -4.85,-2.31 3.81,2.39, body extent -3.8,-2.29 3.8,2.31, height 3.11
"Test Point" [mm]
  round 1.5 smd: 1(0,0)
"TI 3-XFDFN F4 YJC" [mm] "PICOSTAR F4(YJC), 3-Leads, Body 1.00x.0.60mm, Pitch 0.175mm, IPC Medium Density"
  rect 0.25x0.5 smd mask+0.05: D(0.325,0)
  rect 0.25x0.15 smd mask+0.05: G(-0.325,0.175) S(-0.325,-0.175)
  silkscreen extent -0.65,-0.45 0.65,0.45, body extent -0.5,-0.3 0.5,0.3, height 0.35
"TI SON-12 DRZ" [mm] "SON, 12-Leads, Body 2.50x4.00mm, Pitch 0.40mm, Thermal Pad 3.30x2.45mm, IPC Medium Density"
  oval 0.85x0.2 smd paste-0.025 mask+0.05: 1(-1.975,1) 2(-1.975,0.6) 3(-1.975,0.2) 4(-1.975,-0.2) 5(-1.975,-0.6) 6(-1.975,-1) 7(1.975,-1) 8(1.975,-0.6) 9(1.975,-0.2) 10(1.975,0.2) 11(1.975,0.6) 12(1.975,1)
  rect 2.45x1.95 smd paste-10 mask+0.05: 13(0,0)
  Top Layer region: 0.975,0.95 0.975,1.65 1.225,1.65 1.225,0.95
  Top Layer region: 1.225,-0.95 1.225,-1.65 0.975,-1.65 0.975,-0.95
  Top Layer region: -1.225,0.95 -1.225,1.65 -0.975,1.65 -0.975,0.95
  Top Layer region: -0.975,-0.95 -0.975,-1.65 -1.225,-1.65 -1.225,-0.95
  silkscreen extent -2.95,-1.85 2.45,1.85, body extent -2,-1.25 2,1.25, height 1
"TI TSSOP-20 PW" [mm] "TSSOP, 20-Leads, Body 6.50x4.40mm, Pitch 0.65mm, IPC Medium Density"
  oval 1.6x0.35 smd: 1(-2.8,2.925) 2(-2.8,2.275) 3(-2.8,1.625) 4(-2.8,0.975) 5(-2.8,0.325) 6(-2.8,-0.325) 7(-2.8,-0.975) 8(-2.8,-1.625) 9(-2.8,-2.275) 10(-2.8,-2.925) 11(2.8,-2.925) 12(2.8,-2.275) 13(2.8,-1.625) 14(2.8,-0.975) 15(2.8,-0.325) 16(2.8,0.325) 17(2.8,0.975) 18(2.8,1.625) 19(2.8,2.275) 20(2.8,2.925)
  silkscreen extent -2.92,-3.3 1.7,3.73, body extent -3.21,-3.25 3.21,3.25, height 1.2
TPS61032RSAR [mm]
  rect 0.35x0.85 smd: 1(-0.975,1.975) 2(-0.325,1.975) 3(0.325,1.975) 4(0.975,1.975) 9(0.975,-1.975) 10(0.325,-1.975) 11(-0.325,-1.975) 12(-0.975,-1.975)
  rect 0.85x0.35 smd: 5(1.975,0.975) 6(1.975,0.325) 7(1.975,-0.325) 8(1.975,-0.975) 13(-1.975,-0.975) 14(-1.975,-0.325) 15(-1.975,0.325) 16(-1.975,0.975)
  rect 2.7x2.7 smd: 17(0,0)
  silkscreen extent -2.01,-2.06 2.01,2.36, body extent -2,-2 2,2, height 1
"U-BLOX NEO-M8N" [mm] "u-BLOX NEO GPS"
  rrect25% 1.8x0.8 smd: 1(-6,7.001) 2(-6,5.901) 3(-6,4.801) 4(-6,3.701) 5(-6,2.601) 6(-6,1.501) 7(-6,0.401) 8(-6,-2.599) 9(-6,-3.699) 10(-6,-4.799) 11(-6,-5.899) 12(-6,-6.999) 13(6,-6.999) 14(6,-5.899) 15(6,-4.799) 16(6,-3.699) 17(6,-2.599) 18(6,0.401) 19(6,1.501) 20(6,2.601) 21(6,3.701) 22(6,4.801) 23(6,5.901) 24(6,7.001)
  silkscreen extent -7.12,-8 6,8.13, body extent -6.1,-8 6.1,8, height 2.4
"U-BLOX SARA-R4" [mm] "SARA-R4 series, 96-SMD Module, Body 26.0x16.0mm"
  rect 1.5x0.8 smd paste-1 mask+0.05: 1(-6.95,11) 2(-6.95,9.9) 3(-6.95,8.8) 4(-6.95,7.7) 5(-6.95,6.6) 6(-6.95,5.5) 7(-6.95,4.4) 8(-6.95,3.3) 9(-6.95,2.2) 10(-6.95,1.1) 11(-6.95,0) 12(-6.95,-1.1) 13(-6.95,-2.2) 14(-6.95,-3.3) 15(-6.95,-4.4) 16(-6.95,-5.5) 17(-6.95,-6.6) 18(-6.95,-7.7) 19(-6.95,-8.8) 20(-6.95,-9.9) 21(-6.95,-11) 33(6.95,-11) 34(6.95,-9.9) 35(6.95,-8.8) 36(6.95,-7.7) 37(6.95,-6.6) 38(6.95,-5.5) 39(6.95,-4.4) 40(6.95,-3.3) 41(6.95,-2.2) 42(6.95,-1.1) 43(6.95,0) 44(6.95,1.1) 45(6.95,2.2) 46(6.95,3.3) 47(6.95,4.4) 48(6.95,5.5) 49(6.95,6.6) 50(6.95,7.7) 51(6.95,8.8) 52(6.95,9.9) 53(6.95,11)
  rect 0.8x1.5 smd paste-1 mask+0.05: 22(-5.5,-11.95) 23(-4.4,-11.95) 24(-3.3,-11.95) 25(-2.2,-11.95) 26(-1.1,-11.95) 27(0,-11.95) 28(1.1,-11.95) 29(2.2,-11.95) 30(3.3,-11.95) 31(4.4,-11.95) 32(5.5,-11.95) 54(5.5,11.95) 55(4.4,11.95) 56(3.3,11.95) 57(2.2,11.95) 58(1.1,11.95) 59(0,11.95) 60(-1.1,11.95) 61(-2.2,11.95) 62(-3.3,11.95) 63(-4.4,11.95) 64(-5.5,11.95)
  rect 1.1x1.1 smd paste-0.025 mask+0.05: 65(-5.25,10.25) 66(-3.15,10.25) 67(-1.05,10.25) 68(1.05,10.25) 69(3.15,10.25) 70(5.25,10.25) 71(-5.25,8.45) 72(-3.15,8.45) 73(-1.05,8.45) 74(1.05,8.45) 75(3.15,8.45) 76(5.25,8.45) 77(-5.25,6.65) 78(5.25,6.65) 79(-5.25,3.05) 80(5.25,3.05) 81(-5.25,-3.05) 82(5.25,-3.05) 83(-5.25,-6.65) 84(5.25,-6.65) 85(-5.25,-8.45) 86(-3.15,-8.45) 87(-1.05,-8.45) 88(1.05,-8.45) 89(3.15,-8.45) 90(5.25,-8.45) 91(-5.25,-10.25) 92(-3.15,-10.25) 93(-1.05,-10.25) 94(1.05,-10.25) 95(3.15,-10.25) 96(5.25,-10.25)
  silkscreen extent -8.55,-13 8,13.05, body extent -8,-13 8,13, height 3.02
"WINBOND SOIC-8 208MIL WIDE" [mm] "SOIC, 8-Leads, Body 5.28x5.28mm, Pitch 1.27mm, IPC Medium Density"
  oval 1.7x0.6 smd: 1(-3.55,1.905) 2(-3.55,0.635) 3(-3.55,-0.635) 4(-3.55,-1.905) 5(3.55,-1.905) 6(3.55,-0.635) 7(3.55,0.635) 8(3.55,1.905)
  silkscreen extent -3.67,-2.65 2.47,2.88, body extent -4.01,-2.64 4.01,2.64, height 1.5

## Part data
A4: library part "U-BLOX SARA-R410M-02B-01", "RF TXRX CELL 4G LTE CATM1/NB-IOT", Current - Transmitting="100mA ~ 490mA", Device Package="96-SMD Module", Frequency="700MHz, 850MHz, 1.7GHz, 1.9GHz", Manufacturer="U-Blox America Inc.", Operating Temperature="-40°C ~ 85°C", Supplier Part Number 1=672-SARA-R410M-02B-01CT-ND, Voltage - Supply="3.2V ~ 4.2V", Antenna Type="Antenna Not Included, Castellation", ComponentLink1Description=Datasheet, ComponentLink1URL=https://www.u-blox.com/sites/default/files/SARA-R4-N4_DataSheet_%28UBX-16024152%29.pdf, ComponentLink2Description="DigiKey Link", ComponentLink2URL=http://digikey.com/product-detail/en/u-blox-america-inc/SARA-R410M-02B-01/672-SARA-R410M-02B-01CT-ND/9565823, LastUpdated="31/01/2020 01:23:17", Lifecycle Status=Active, Minimum Order=1, Mounting Type="Surface Mount", Package / Case="96-SMD Module", Packaging=TapeAndReel, Part Number=SARA-R410M-02B-01, Part Status=Active, Price=21.39, Protocol="4G LTE CAT M1/NB-IoT", RF Family/Standard=Cellular, Sensitivity=-107.5dBm, Serial Interfaces="I²C, SPI, UART, USB", Series=SARA-R4, Supplier 1=DigiKey
A5: library part "Basic Antenna", "RF ANT 829MHZ/1.94GHZ CHIP SLD", Frequency (Center/Band)="829MHz, 1.94GHz, 2.35GHz, 2.6GHz", Frequency Group="Wide Band", Frequency Range="698MHz ~ 960MHz, 1.71GHz ~ 2.17GHz, 2.3GHz ~ 2.4GHz, 2.5GHz ~ 2.7GHz", Manufacturer="Linx Technologies Inc.", Supplier Part Number 1=ANT-LTE-CER-TCT-ND, Antenna Type=Chip, Applications="CAT-M1, Cellular, LTE, NB-IOT, 3G, 4G", ComponentLink1Description=Datasheet, ComponentLink1URL=https://linxtechnologies.com/wp/wp-content/uploads/ant-lte-cer.pdf, ComponentLink2Description="DigiKey Link", ComponentLink2URL=http://digikey.com/product-detail/en/linx-technologies-inc/ANT-LTE-CER-T/ANT-LTE-CER-TCT-ND/8556788, Gain=4dBi, Height (Max)="0.203\" (5.15mm)", LastUpdated="30/03/2020 15:23:26", Lifecycle Status=Active, Minimum Order=1, Mounting Type="Surface Mount", Number of Bands=4, Packaging=TapeAndReel, Part Number=ANT-LTE-CER-T, Part Status=Active, Price=3.43, RF Family/Standard=Cellular, Series=CER, Supplier 1=DigiKey, Termination=Solder, VSWR="4, 3.2, 2.5, 2.5"
A6: library part "U-BLOX NEO-M8N", "RF RCVR GNSS/GPS 1.575GHZ 24LCC", Current - Receiving=21mA, Device Package="24-SMD Module", Frequency=1.575GHz, Manufacturer="U-Blox America Inc.", Operating Temperature="-40°C ~ 85°C", Supplier Part Number 1=672-NEO-M8N-0-10CT-ND, Voltage - Supply="1.65V ~ 3.6V", Applications="General Purpose", ComponentLink1Description=Datasheet, ComponentLink1URL=https://www.u-blox.com/sites/default/files/NEO-M8-FW3_DataSheet_%28UBX-15031086%29.pdf, ComponentLink2Description="DigiKey Link", ComponentLink2URL=http://digikey.com/product-detail/en/u-blox-america-inc/NEO-M8N-0-10/672-NEO-M8N-0-10CT-ND/6150671, Data Interface="I2C, SPI, UART, USB", LastUpdated="04/01/2020 00:19:34", Lifecycle Status=Active, Minimum Order=1, Modulation or Protocol="BeiDou, Galileo, GLONASS, GNSS, GPS", Package / Case="24-SMD Module", Packaging=ReReel, Part Number=NEO-M8N-0-10, Part Status=Active, PartId=3, Price=0.00, Sensitivity=-167dBm, Series=NEO-M8, Supplier 1=DigiKey
A7: library part "Basic Antenna", "RF ANT CER PATCH SOLDER SMD", Frequency Group="UHF (1GHz ~ 2GHz)", Manufacturer=Molex, Supplier Part Number 1=WM16802-ND, Antenna Type="Ceramic Patch", Applications="Beidou, GLONASS, GPS", ComponentLink1Description=Datasheet, ComponentLink1URL=http://www.literature.molex.com/SQLImages/kelmscott/Molex/PDF_Images/987651-5071.pdf, ComponentLink2Description="DigiKey Link", ComponentLink2URL=http://digikey.com/product-detail/en/molex/2042860001/WM16802-ND/7566910, Gain=5.5dBi, Height (Max)="0.157\" (4.00mm)", LastUpdated="12/12/2019 06:31:41", Lifecycle Status=0, Minimum Order=1, Mounting Type="Through Hole", Number of Bands=1, Packaging=Tray, Part Number=2042860001, Part Status=Active, Price=2.23, Return Loss=-10dB, RF Family/Standard=Navigation, Supplier 1=DigiKey, Termination=Solder
C1 C2 C3 C10: library part Capacitor, "CAP CER 10UF 16V X5R 0603", Device Package="0603 (1608 Metric)", Manufacturer="TDK Corporation", Operating Temperature="-55°C ~ 125°C", Part Number=C1608X5R1C106M080AB, Supplier Part Number 1=445-9065-2-ND, Temperature Coefficient=X5R, Tolerance=±10%, Voltage - Rated=16V, Applications="General Purpose", Capacitance=10µF, ComponentLink1Description=Datasheet, ComponentLink1URL="http://www.samsungsem.com/kr/support/product-search/mlcc/CL32B106KBJNNNE .jsp", ComponentLink2Description="DigiKey Link", ComponentLink2URL=http://digikey.com/product-detail/en/samsung-electro-mechanics/CL32B106KBJNNNE/1276-3387-1-ND/3891473, LastUpdated="21/01/2020 00:30:21", Lifecycle Status=Active, Minimum Order=1, Mounting Type="Surface Mount, MLCC", Package / Case="0603 (1608 Metric)", Packaging=TapeAndReel, Part Status=Active, PartId=24115, Price=0.17, Series=CL, Size / Dimension="0.063\" L x 0.031\" W (1.60mm x 0.80mm)", Supplier 1=DigiKey, Thickness (Max)="0.106\" (2.70mm)"
C4 C16: library part Capacitor, "CAP CER 3PF 50V C0G/NP0 0402", Operating Temperature="-55°C ~ 125°C", Package / Case="0402 (1005 Metric)", ComponentLink1Description=Datasheet, ComponentLink1URL=https://search.murata.co.jp/Ceramy/image/img/A01X/G101/ENG/GJM0335C1E3R0CB01-01.pdf, ComponentLink2Description="DigiKey Link", ComponentLink2URL=http://digikey.com/product-detail/en/murata-electronics/GJM0335C1E3R0CB01D/490-3064-1-ND/702330, Features="High Q, Low Loss", Lifecycle Status=Active, Minimum Order=1, Mounting Type="Surface Mount, MLCC", Supplier 1=DigiKey
C5 C6 C7: library part GRM033R61C104ME84D, "CAP CER 0.1UF 16V X5R 0201", Device Package="0201 (0603 Metric)", Manufacturer="Murata Electronics", Operating Temperature="-55°C ~ 85°C", Supplier Part Number 1=490-9986-1-ND, Temperature Coefficient=X5R, Tolerance=±20%, Voltage - Rated=16V, Applications="General Purpose", Capacitance=0.1µF, ComponentLink1Description=Datasheet, ComponentLink1URL=https://search.murata.co.jp/Ceramy/image/img/A01X/G101/ENG/GRM033R61C104ME84-01.pdf, ComponentLink2Description="DigiKey Link", ComponentLink2URL=http://digikey.com/product-detail/en/murata-electronics/GRM033R61C104ME84D/490-9986-1-ND/5026291, LastUpdated="21/01/2020 00:00:12", Lifecycle Status=Active, Minimum Order=1, Mounting Type="Surface Mount, MLCC", Package / Case="0201 (0603 Metric)", Packaging=TapeAndReel, Part Number=GRM033R61C104ME84D, Part Status=Active, PartId=1522, Price=0.01, Series=GRM, Size / Dimension="0.024\" L x 0.012\" W (0.60mm x 0.30mm)", Supplier 1=DigiKey, Thickness (Max)="0.013\" (0.33mm)"
C8: library part T491D227K016AT, "CAP TANT 220UF 10% 16V 2917", Case Code (Imperial)=2917, Case Code (Metric)=7343, Dielectric Material=Tantalum, ESR (Equivalent Series Resistance)=900mR, Leakage Current=35.2uA, Manufacturer=KEMET, Max Operating Temperature=125°C, Min Operating Temperature=-55°C, Package Quantity=1, Supplier Part Number 1=8015479, Tolerance=10%, Voltage=16V, Capacitance=220uF, Case/Package=2917, Category="Tantalum Capacitors", ComponentLink1Description=https://datasheet.ciiva.com/14885/kem-t2005-t491-14885000.pdf?src-supplier=Digi-Key, ComponentLink1URL=https://datasheet.ciiva.com/14885/kem-t2005-t491-14885000.pdf?src-supplier=Digi-Key, ComponentLink2Description=https://datasheet.ciiva.com/14884/kem-t2005-t491-14884999.pdf?src-supplier=Digi-Key, ComponentLink2URL=https://datasheet.ciiva.com/14884/kem-t2005-t491-14884999.pdf?src-supplier=Digi-Key, ComponentLink3Description=https://datasheet.ciiva.com/14885/kem-t2005-t491-14885001.pdf?src-supplier=Digi-Key, ComponentLink3URL=https://datasheet.ciiva.com/14885/kem-t2005-t491-14885001.pdf?src-supplier=Digi-Key, Construction=Flat, Depth=4.3mm, Features="General Purpose", Height=2.8mm, Height - Seated (Max)=0.122inch, Lead Free="Lead Free", Length=7.3mm, Manufacturer Part Number=T491D227K016AT, Mount="Surface Mount", Number of Pins=2, Packaging="Cut Tape", Pricing 1="5=2.59000, 50=2.41000, 100=2.25400, 250=2.09800, 500=1.89100 (USD)", Radiation Hardening=No, REACH SVHC="No SVHC", RoHS=Yes, RoHS Compliant=Yes, Series=T491, Stock 1=35, Supplier 1=RSComponents, Termination=SMD/SMT, Voltage Rating=16V, Voltage Rating (DC)=16V, Width=0.169inch
C9: library part GRM033R61A225ME47D, "CAP CER 2.2UF 10V X5R 0201", Case Code (Imperial)=0201, Case Code (Metric)=0603, Dielectric=X5R, Manufacturer=Murata, Max Operating Temperature=85°C, Min Operating Temperature=-55°C, Tolerance=20%, Voltage Rating=10V, Capacitance=2.2uF, Case/Package=0201, Category="Ceramic Capacitors", ComponentLink1Description=http://search.murata.co.jp/Ceramy/image/img/A01X/G101/ENG/GRM033R61A225ME47-01.pdf?src-supplier=Digi-Key, ComponentLink1URL=http://search.murata.co.jp/Ceramy/image/img/A01X/G101/ENG/GRM033R61A225ME47-01.pdf?src-supplier=Digi-Key, ComponentLink2Description=https://www.murata.com/~/media/webrenewal/support/library/catalog/products/capacitor/mlcc/c02e.ashx?la=en-us&src-supplier=Digi-Key, ComponentLink2URL=https://www.murata.com/~/media/webrenewal/support/library/catalog/products/capacitor/mlcc/c02e.ashx?la=en-us&src-supplier=Digi-Key, Length=0.024inch, Manufacturer Part Number=GRM033R61A225ME47D, Mount="Surface Mount", Packaging="Tape and Reel", Pricing 1="15000=0.04772, 30000=0.04483, 60000=0.04193, 90000=0.03904, 120000=0.03615, 150000=0.03495, 1500000=0.03374 (USD)", RoHS=Yes, RoHS Compliant=Yes, Supplier 1=Avnet, Supplier Part Number 1=GRM033R61A225ME47D, Thickness=0.015inch, Voltage Rating (DC)=10V, Width=0.012inch
C11 C17 C18 C19 C21 C22 C24 C25 C26 C27 C28 C32 C33 C34 C35 C37 C39 C40 C44 C52 C53 C54 C56 C57: library part Capacitor, "CAP CER 0.1UF 16V X5R 0201", Device Package="0201 (0603 Metric)", Manufacturer="Murata Electronics", Operating Temperature="-55°C ~ 85°C", Part Number=GRM033R61C104ME84D, Supplier Part Number 1=490-9986-1-ND, Temperature Coefficient=X5R, Tolerance=±20%, Voltage - Rated=16V, Applications="General Purpose", Capacitance=0.1µF, ComponentLink1Description=Datasheet, ComponentLink1URL=https://search.murata.co.jp/Ceramy/image/img/A01X/G101/ENG/GRM033R61C104ME84-01.pdf, ComponentLink2Description="DigiKey Link", ComponentLink2URL=http://digikey.com/product-detail/en/murata-electronics/GRM033R61C104ME84D/490-9986-1-ND/5026291, LastUpdated="21/01/2020 00:00:12", Lifecycle Status=Active, Minimum Order=1, Mounting Type="Surface Mount, MLCC", Package / Case="0201 (0603 Metric)", Packaging=TapeAndReel, Part Status=Active, PartId=1522, Price=0.01, Series=GRM, Size / Dimension="0.024\" L x 0.012\" W (0.60mm x 0.30mm)", Supplier 1=DigiKey, Thickness (Max)="0.013\" (0.33mm)"
C12 C13: library part Capacitor, "CAP CER 1UF 16V X5R 0402", Device Package="0402 (1005 Metric)", Manufacturer="Murata Electronics", Operating Temperature="-55°C ~ 85°C", Part Number=GRM155R61C105MA12D, Supplier Part Number 1=490-14599-1-ND, Temperature Coefficient=X5R, Tolerance=±20%, Voltage - Rated=16V, Applications="General Purpose", Capacitance=1µF, ComponentLink1Description=Datasheet, ComponentLink1URL=https://search.murata.co.jp/Ceramy/image/img/A01X/G101/ENG/GRM155R61C105MA12-01.pdf, ComponentLink2Description="DigiKey Link", ComponentLink2URL=http://digikey.com/product-detail/en/murata-electronics/GRM155R61C105MA12D/490-14599-1-ND/6606205, LastUpdated="01/04/2020 23:56:41", Lifecycle Status=Active, Minimum Order=1, Mounting Type="Surface Mount, MLCC", Package / Case="0402 (1005 Metric)", Packaging=TapeAndReel, Part Status=Active, PartId=10295, Price=0.01, Series=GRM, Size / Dimension="0.039\" L x 0.020\" W (1.00mm x 0.50mm)", Supplier 1=DigiKey, Thickness (Max)="0.022\" (0.55mm)"
C20 C23: library part Capacitor, "CAP CER 0.47UF 10V X5R 0201", Device Package="0201 (0603 Metric)", Manufacturer="TDK Corporation", Operating Temperature="-55°C ~ 85°C", Part Number=C0603X5R1A474M030BC, Supplier Part Number 1=445-13666-2-ND, Temperature Coefficient=X5R, Tolerance=±20%, Voltage - Rated=10V, Applications="General Purpose", Capacitance=0.47µF, ComponentLink1Description=Datasheet, ComponentLink1URL=https://search.murata.co.jp/Ceramy/image/img/A01X/G101/ENG/GRM033R60J474ME90-01.pdf, ComponentLink2Description="DigiKey Link", ComponentLink2URL=http://digikey.com/product-detail/en/murata-electronics/GRM033R60J474ME90D/490-10410-1-ND/5026287, LastUpdated="21/01/2020 00:00:17", Lifecycle Status=Active, Minimum Order=1, Mounting Type="Surface Mount, MLCC", Package / Case="0201 (0603 Metric)", Packaging=TapeAndReel, Part Status=Active, PartId=705, Price=0.02, Size / Dimension="0.024\" L x 0.012\" W (0.60mm x 0.30mm)", Supplier 1=DigiKey, Thickness (Max)="0.013\" (0.33mm)"
C31 C58: library part Capacitor, "CAP CER 10UF 6.3V X5R 0402", Device Package="0402 (1005 Metric)", Manufacturer="Murata Electronics", Operating Temperature="-55°C ~ 85°C", Part Number=GRM155R60J106ME15D, Supplier Part Number 1=490-13238-1-ND, Temperature Coefficient=X5R, Tolerance=±20%, Voltage - Rated=6.3V, Applications="General Purpose", Capacitance=10µF, ComponentLink1Description=Datasheet, ComponentLink1URL=https://www.murata.com/~/media/webrenewal/support/library/catalog/products/capacitor/mlcc/c02e.ashx?la=en-us, ComponentLink2Description="DigiKey Link", ComponentLink2URL=http://digikey.com/product-detail/en/murata-electronics/GRM155R60J106ME15D/490-13238-1-ND/5877446, LastUpdated="01/04/2020 23:56:51", Lifecycle Status=Active, Minimum Order=1, Mounting Type="Surface Mount, MLCC", Package / Case="0402 (1005 Metric)", Packaging=TapeAndReel, Part Status=Active, PartId=6754, Price=0.03, Series=GRM, Size / Dimension="0.039\" L x 0.020\" W (1.00mm x 0.50mm)", Supplier 1=DigiKey, Thickness (Max)="0.026\" (0.65mm)"
C36 C41 C55: library part Capacitor, "CAP CER 10000PF 6.3V X7R 0201", Device Package="0201 (0603 Metric)", Manufacturer="TDK Corporation", Operating Temperature="-55°C ~ 125°C", Part Number=CGA1A2X7R0J103M030BA, Ratings=AEC-Q200, Supplier Part Number 1=445-12116-1-ND, Temperature Coefficient=X7R, Tolerance=±20%, Voltage - Rated=6.3V, Applications=Automotive, Capacitance=10000pF, ComponentLink1Description=Datasheet, ComponentLink1URL=https://product.tdk.com/info/en/catalog/datasheets/mlcc_automotive_general_en.pdf?ref_disty=digikey, ComponentLink2Description="DigiKey Link", ComponentLink2URL=http://digikey.com/product-detail/en/tdk-corporation/CGA1A2X7R0J103M030BA/445-12116-1-ND/3953782, LastUpdated="21/01/2020 00:00:11", Lifecycle Status=Active, Minimum Order=1, Mounting Type="Surface Mount, MLCC", Package / Case="0201 (0603 Metric)", Packaging=TapeAndReel, Part Status=Active, PartId=1683, Price=0.01, Series=CGA, Size / Dimension="0.024\" L x 0.012\" W (0.60mm x 0.30mm)", Supplier 1=DigiKey, Thickness (Max)="0.013\" (0.33mm)"
C38: library part Capacitor, "CAP CER 1UF 6.3V X6S 0402", Device Package="0402 (1005 Metric)", Manufacturer="Taiyo Yuden", Operating Temperature="-55°C ~ 105°C", Part Number=JMK105C6105KV-F, Supplier Part Number 1=587-3381-1-ND, Temperature Coefficient=X6S, Tolerance=±10%, Voltage - Rated=6.3V, Applications="General Purpose", Capacitance=1µF, ComponentLink1Description=Datasheet, ComponentLink1URL=https://www.yuden.co.jp/productdata/catalog/mlcc01_e.pdf, ComponentLink2Description="DigiKey Link", ComponentLink2URL=http://digikey.com/product-detail/en/taiyo-yuden/JMK105C6105KV-F/587-3381-1-ND/4157200, LastUpdated="01/04/2020 23:56:34", Lifecycle Status=Active, Minimum Order=1, Mounting Type="Surface Mount, MLCC", Package / Case="0402 (1005 Metric)", Packaging=TapeAndReel, Part Status=Active, PartId=12563, Price=0.01, Series=M, Size / Dimension="0.039\" L x 0.020\" W (1.00mm x 0.50mm)", Supplier 1=DigiKey, Thickness (Max)="0.022\" (0.55mm)"
C42 C43: library part "Polarised Capacitor", "CAP TANT 470UF 20% 6.3V 1411", Device Package="1411 (3528 Metric)", ESR (Equivalent Series Resistance)="500mOhm @ 100kHz", Lifetime @ Temp.="2000 Hrs @ 85°C", Manufacturer="AVX Corporation", Manufacturer Size Code=B, Operating Temperature="-55°C ~ 125°C", Part Number=F950J477MBAAQ2, Supplier Part Number 1=478-10647-1-ND, Tolerance=±20%, Voltage - Rated=6.3V, Capacitance=470µF, ComponentLink1Description=Datasheet, ComponentLink1URL=http://datasheets.avx.com/F95.pdf, ComponentLink2Description="DigiKey Link", ComponentLink2URL=http://digikey.com/product-detail/en/avx-corporation/F950J477MBAAQ2/478-10647-1-ND/7423938, Features="General Purpose", Height - Seated (Max)="0.079\" (2.00mm)", LastUpdated="21/01/2020 01:52:25", Lifecycle Status=Active, Minimum Order=1, Mounting Type="Surface Mount", Package / Case="1411 (3528 Metric)", Packaging=TapeAndReel, Part Status=Active, PartId=2180, Price=0.63, Series="F95, Frameless™", Size / Dimension="0.138\" L x 0.110\" W (3.50mm x 2.80mm)", Supplier 1=DigiKey, Type="Conformal Coated"
C45 C46 C47 C48 C51: library part Capacitor, "CAP CER 47PF 25V NP0 0201", Device Package="0201 (0603 Metric)", Manufacturer=KEMET, Operating Temperature="-55°C ~ 125°C", Part Number=C0201C470K3GAC7867, Supplier Part Number 1=399-14263-1-ND, Temperature Coefficient="C0G, NP0", Tolerance=±10%, Voltage - Rated=25V, Applications="General Purpose", Capacitance=47pF, ComponentLink1Description=Datasheet, ComponentLink1URL=https://api.kemet.com/component-edge/download/datasheet/C0201C470K3GAC7867.pdf, ComponentLink2Description="DigiKey Link", ComponentLink2URL=http://digikey.com/product-detail/en/kemet/C0201C470K3GAC7867/399-14263-1-ND/6827254, Features="Low ESL", LastUpdated="21/01/2020 00:00:12", Lifecycle Status=Active, Minimum Order=1, Mounting Type="Surface Mount, MLCC", Package / Case="0201 (0603 Metric)", Packaging=TapeAndReel, Part Status=Active, PartId=1548, Price=0.01, Series="SMD Comm C0G", Size / Dimension="0.024\" L x 0.012\" W (0.60mm x 0.30mm)", Supplier 1=DigiKey, Thickness (Max)="0.013\" (0.33mm)"
C49: library part Capacitor, "CAP CER 3PF 50V C0G/NP0 0402", Manufacturer="Murata Electronics", Operating Temperature="-55°C ~ 125°C", Package / Case="0402 (1005 Metric)", Part Number=GRM1555C1H3R0CA01D, Supplier Part Number 1=490-5872-2-ND, Temperature Coefficient="C0G, NP0", Tolerance=±0.25pF, Voltage - Rated=50V, Applications="RF, Microwave, High Frequency", Capacitance=3pF, ComponentLink1Description=Datasheet, ComponentLink1URL=https://search.murata.co.jp/Ceramy/image/img/A01X/G101/ENG/GJM0335C1E3R0CB01-01.pdf, ComponentLink2Description="DigiKey Link", ComponentLink2URL=http://digikey.com/product-detail/en/murata-electronics/GJM0335C1E3R0CB01D/490-3064-1-ND/702330, Features="High Q, Low Loss", LastUpdated="21/01/2020 02:09:19", Lifecycle Status=Active, Minimum Order=1, Mounting Type="Surface Mount, MLCC", Packaging=TapeAndReel, Part Status=Active, PartId=337, Price=0.01, Series=GRM, Supplier 1=DigiKey, Thickness (Max)="0.013\" (0.33mm)"